# Altium PCB PCB_2023.PcbDoc
Units mm, origin at the board's own origin, x right, y up, seen from the top; angles counter-clockwise.
Board outline 30 x 42 mm, 6 copper layers (L1 (SGN), L2 (GND), L3 (SGN), L4 (GND/PWR), L5 (PWR/GND), L6 (SGN)), stack 0.77 mm thick; 57 components, 71 nets, 293 pads, 220 vias.
Unrouted connection lines stored in the file: 2.
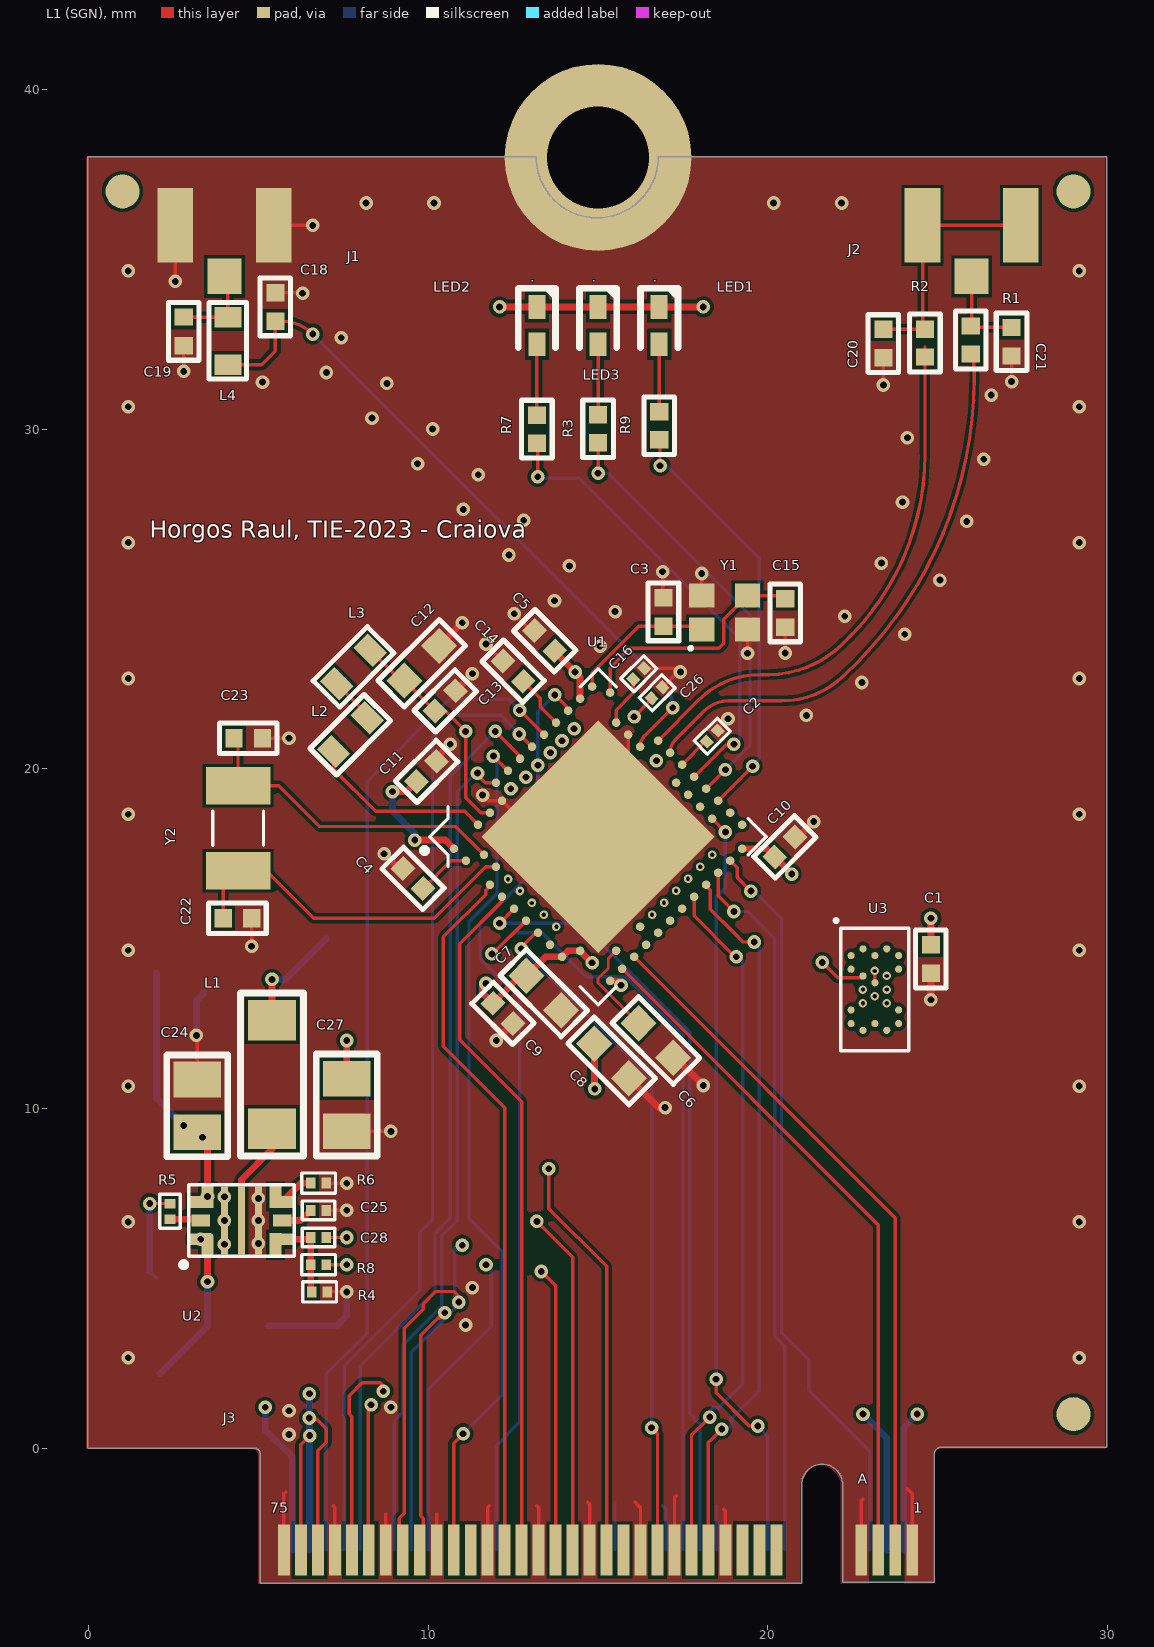
[diagram p0: L1 (SGN) view]
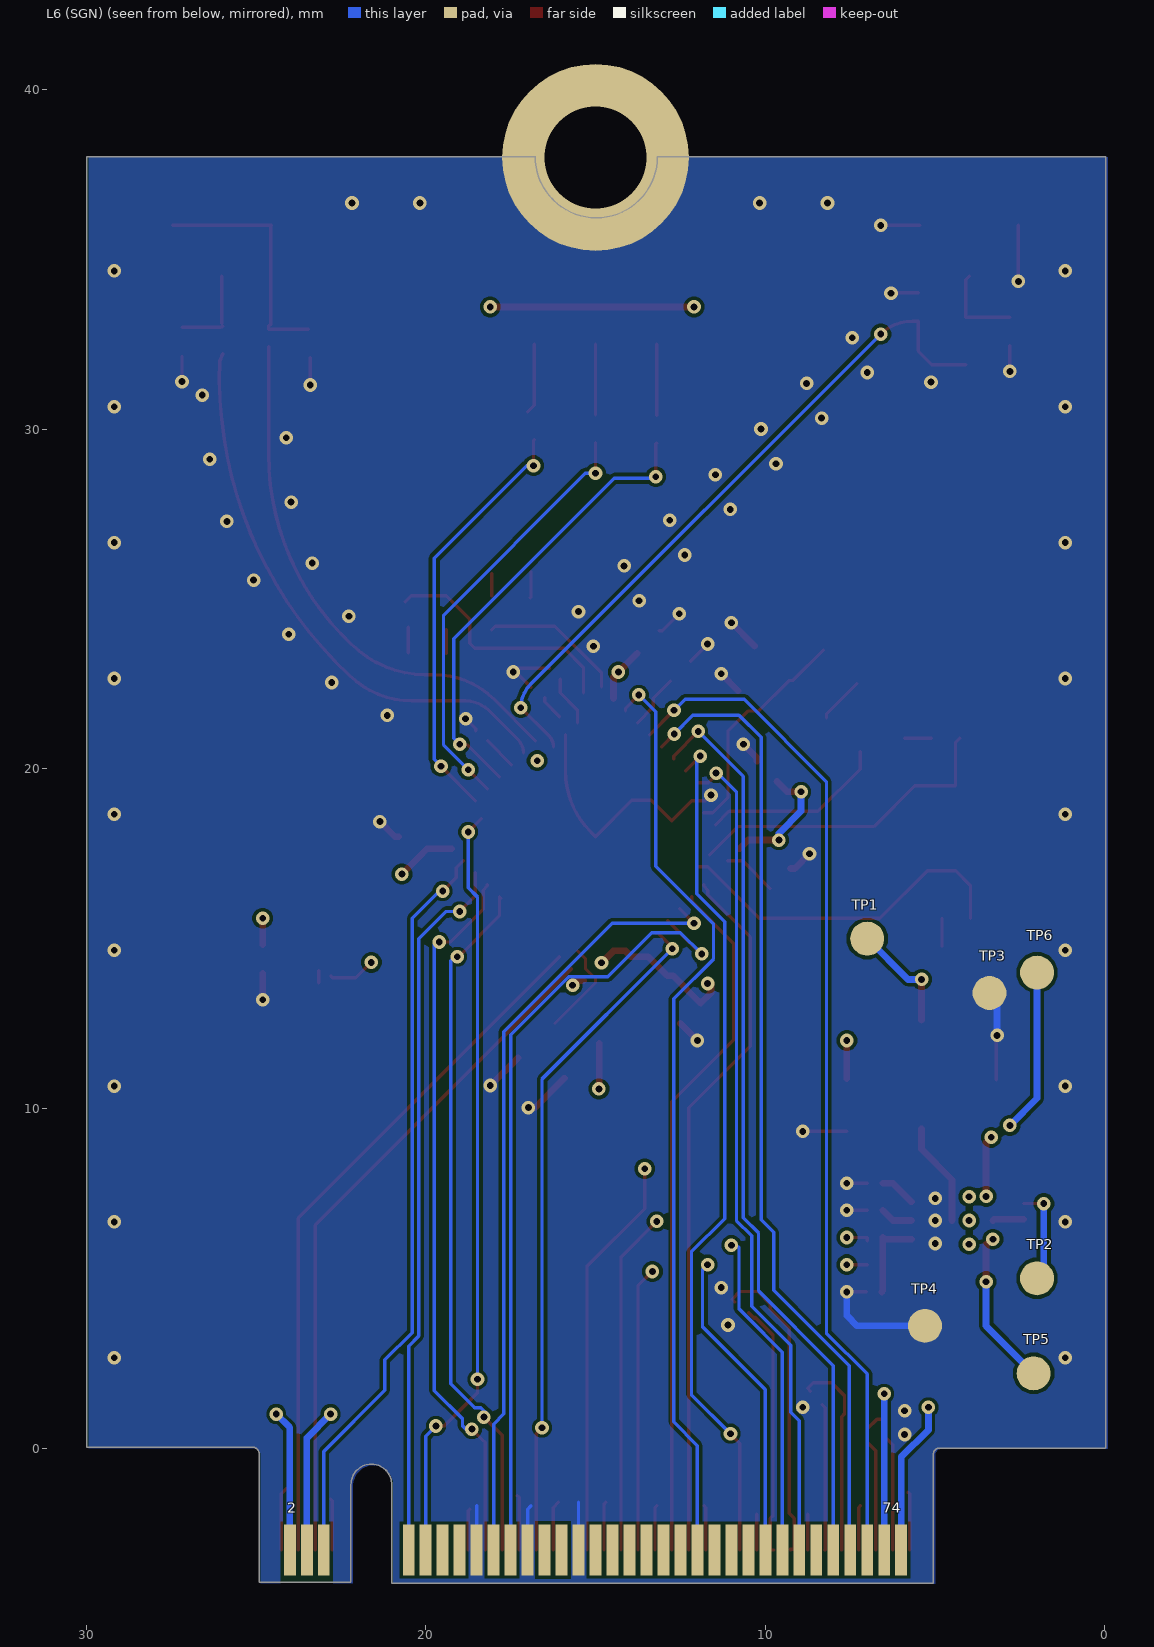
[diagram p1: L6 (SGN) view, seen from below]
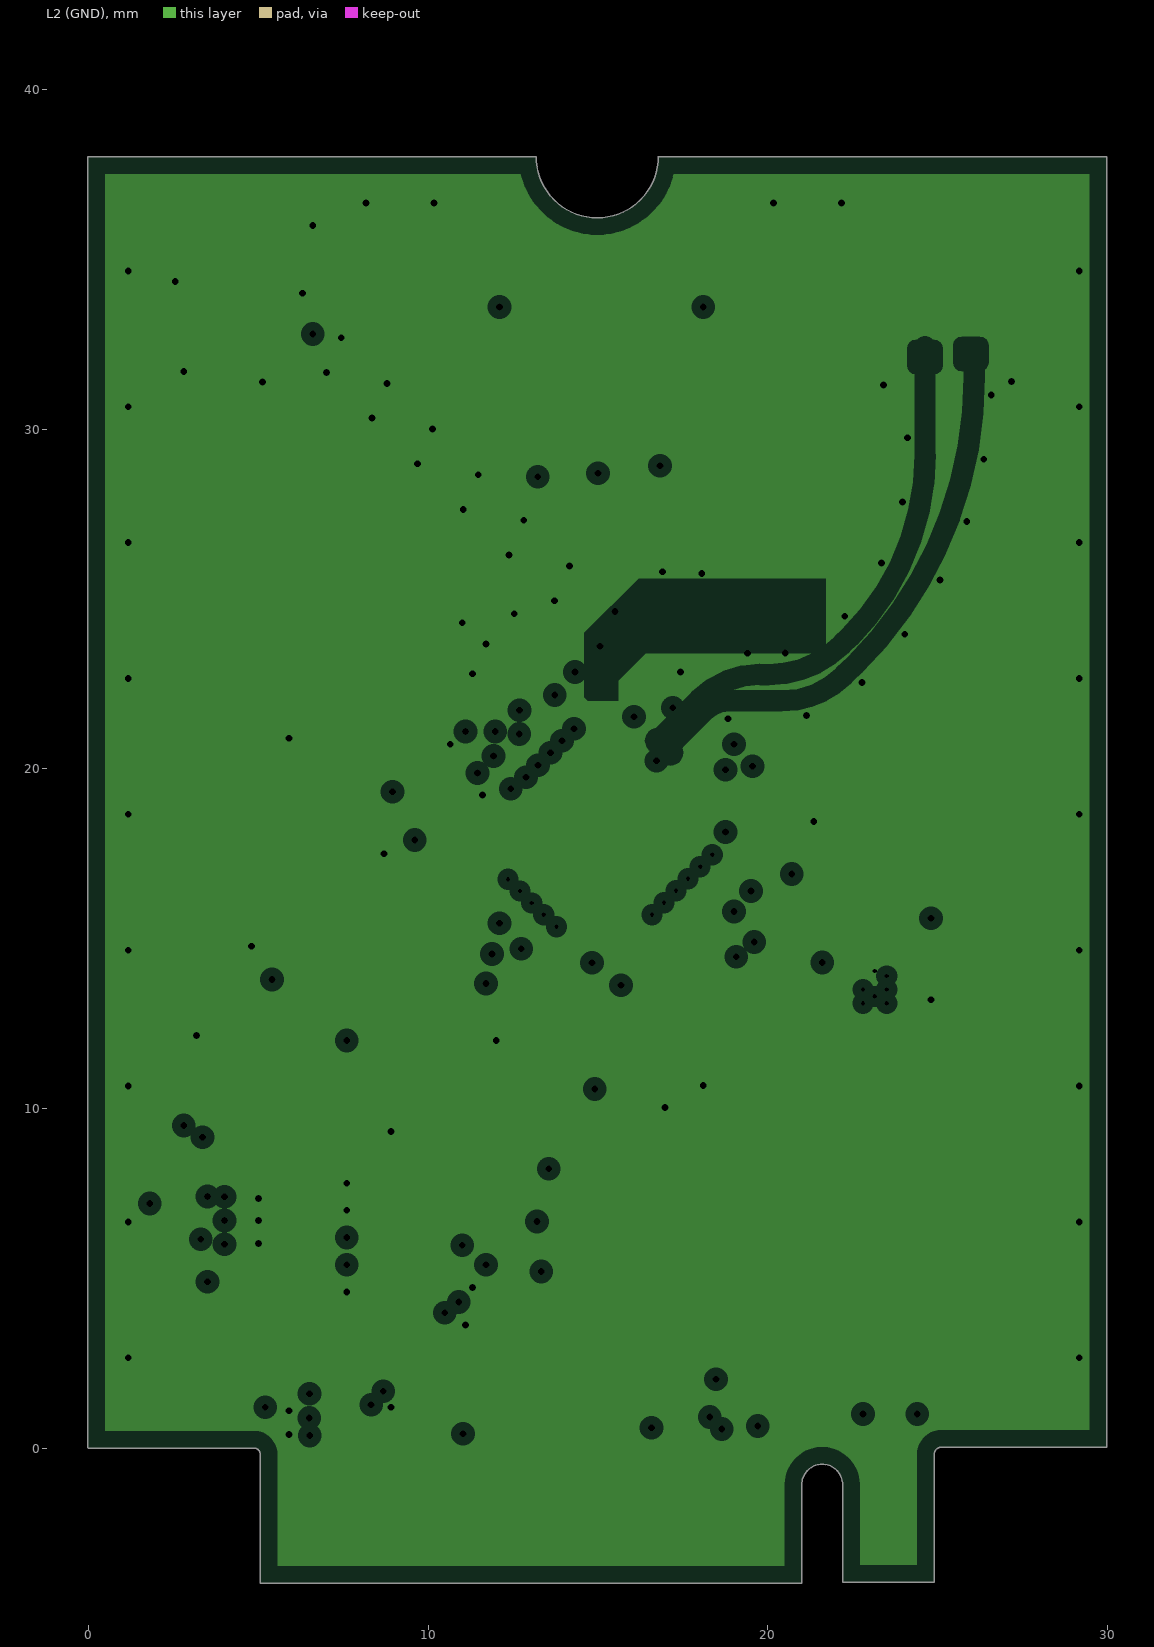
[diagram p2: L2 (GND), clearances drawn from the general rule]
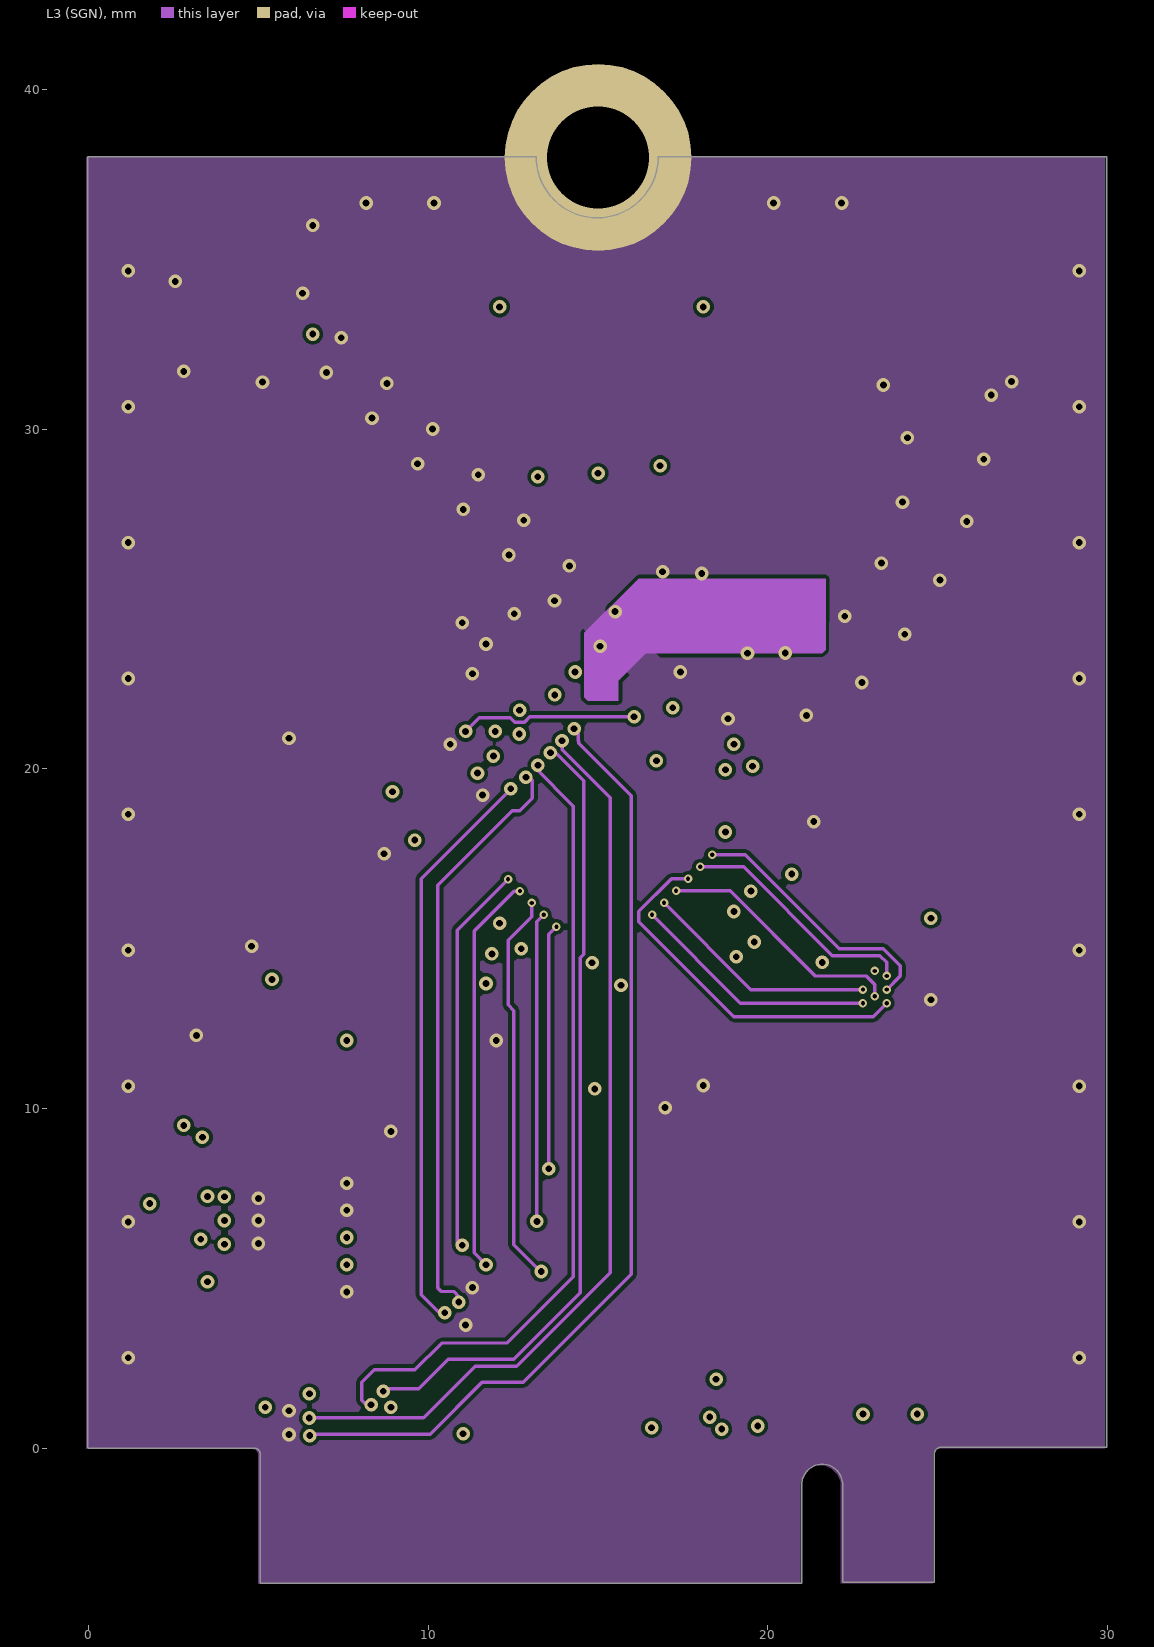
[diagram p3: L3 (SGN)]
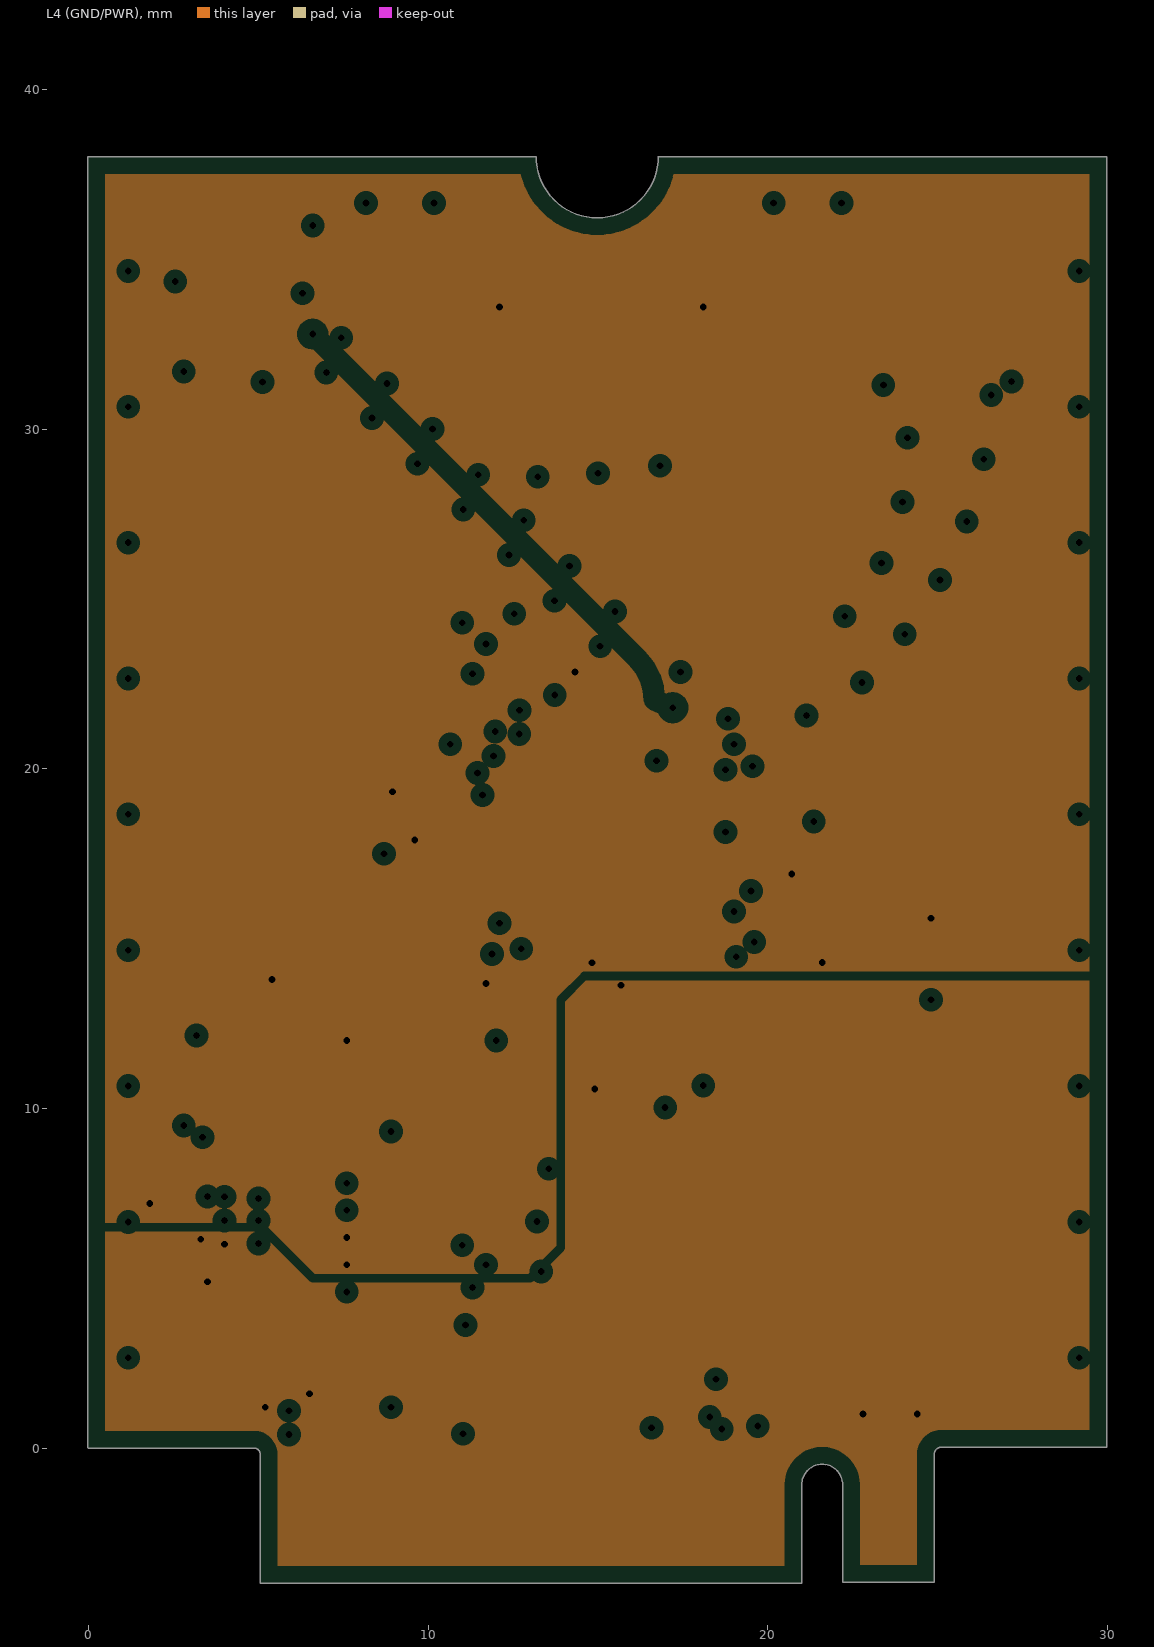
[diagram p4: L4 (GND/PWR), clearances drawn from the general rule]
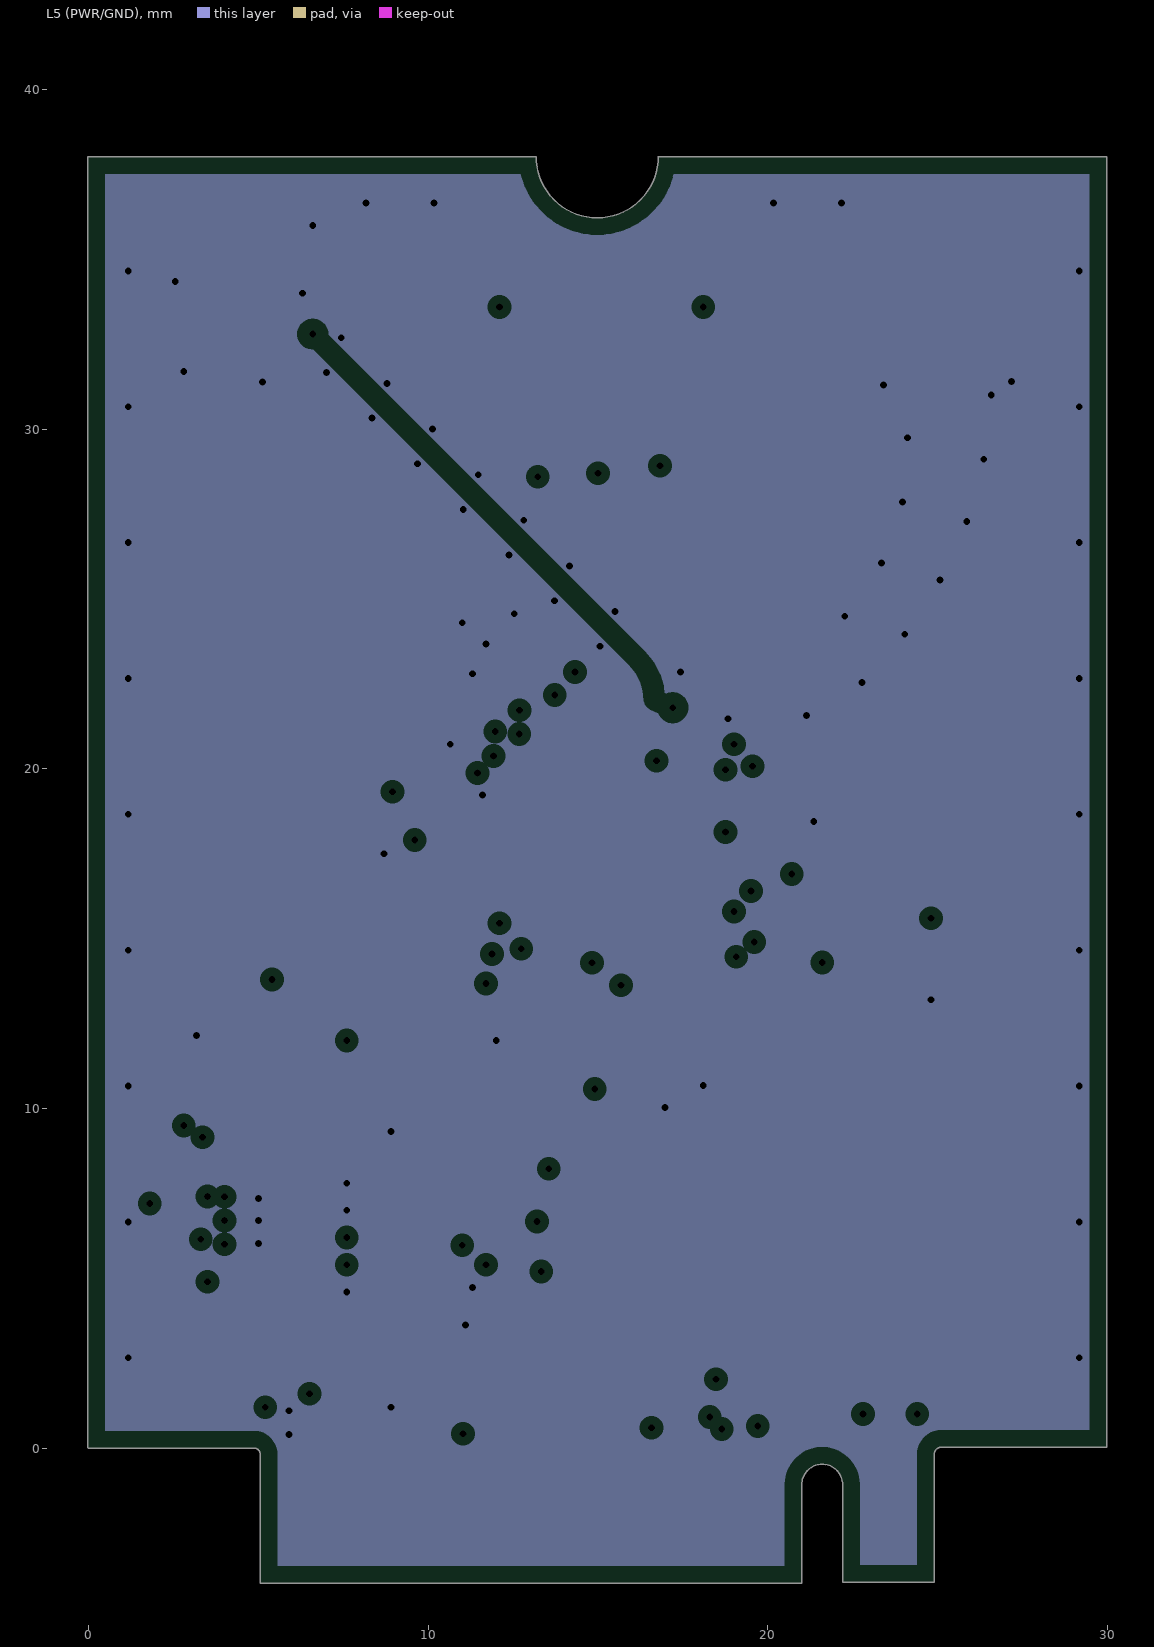
[diagram p5: L5 (PWR/GND), clearances drawn from the general rule]
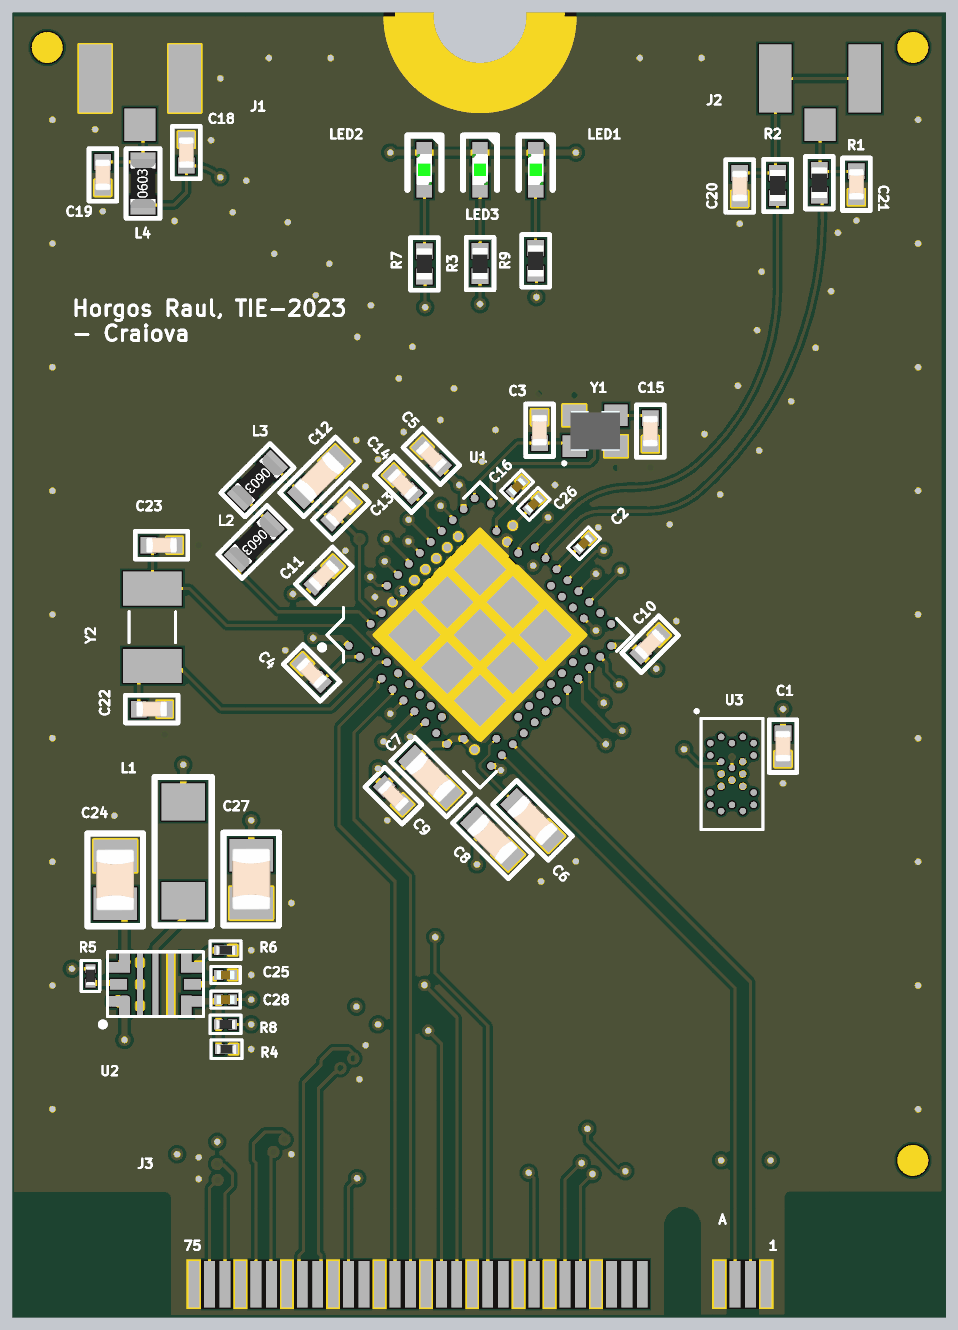
[diagram p6: 3D render of the assembled board from above, using the file's embedded part models]

## Layer stack, top to bottom
Top Solder: solder mask 0.025, Solder Resist, Dk 3.5
L1 (SGN): signal copper 0.035
Dielectric 1: prepreg 0.06, PP-006, Dk 4.1
L2 (GND): plane copper 0.015, net GND
Dielectric 2: prepreg 0.1, PP-006, Dk 4.1
L3 (SGN): signal copper 0.035
Dielectric 3: dielectric 0.1, FR-4, Dk 4.8
L4 (GND/PWR): plane copper 0.035, net VDD
Dielectric 4: core 0.26, PP-006, Dk 4.1
L5 (PWR/GND): plane copper 0.035, net GND
Dielectric 5: prepreg 0.06, PP-006, Dk 4.1
L6 (SGN): signal copper 0.035
Bottom Solder: solder mask 0.025, Solder Resist, Dk 3.5

## Board outline
5.05,-3.975 5.05,-0.175 ccw(c4.875,-0.175) 4.875,0 0,0 cw(c0,0.025) -0.025,0.025 -0.025,38.025 13.175,38.025 ccw(c14.975,38.025) 16.775,38.025 29.975,38.025 29.975,0.025 25.1,0.025 ccw(c25.1,-0.175) 24.9,-0.175 24.9,-3.95 22.2,-3.95 22.2,-1.075 ccw(c21.6,-1.075) 21.6,-0.475 ccw(c21.6,-1.075) 21,-1.075 21,-3.975

## Design rules (kind name [scope] priority, off if disabled: settings)
Clearance Clearance_VIA [InComponent('U1') or InComponent('U3') vs InComponent('U1') or InComponent('U3')] p1: gap=0 ignorepadtopadclearanceinfootprint=FALSE except(0.1: Arc-Arc Arc-Track Arc-SMDPad Track-Track Track-SMDPad SMDPad-THPad THPad-THPad THPad-Via Via-Via; 0.15: SMDPad-Via; 0.2: Arc-THPad Arc-Via Track-THPad Track-Via; 0.35: SMDPad-SMDPad)
Clearance [All] p2: gap=0.1 ignorepadtopadclearanceinfootprint=FALSE except(0.35: SMDPad-SMDPad)
DiffPairsRouting DiffPair_DiffPairsRouting [InDifferentialPairClass('D90')] p1: maxlimit=0.38 minlimit=0.38 mostfreqgap=0.38 toplayer_minwidth=0.1 toplayer_maxwidth=0.1 toplayer_prefwidth=0.1 midlayer1_minwidth=0.1 midlayer1_maxwidth=0.1 midlayer1_prefwidth=0.1 bottomlayer_minwidth=0.1 bottomlayer_maxwidth=0.1 bottomlayer_prefwidth=0.1 impedanceprofiledriven=TRUE impedanceprofileid={CCA79D93-A0CD-4789-A958-CFDB072DEA31} impedanceprofilevalue=90.000000 maxuncoupledlength=12.7
HoleToHoleClearance [All] p1: gap=0.1 allowstackedmicrovias=TRUE
MatchedLengths DiffPair_MatchedLengths [All] p1: tolerance=25.4 checknetsindiffpair=FALSE checkdiffpairvsdiffpair=TRUE checkxsignals=TRUE checkothers=TRUE
MinimumSolderMaskSliver [All] p1: minsoldermaskwidth=0.1
PlaneClearance [All] p1: clearance=0.25
PlaneConnect [All] p1: planeconnectstyle=Relief reliefexpansion=0.2 reliefentries=4 reliefconductorwidth=0.2 reliefairgap=0.2
PolygonConnect [All] p1: connectstyle=Direct reliefconductorwidth=0.254 reliefentries=4 polygonreliefangle="90 Angle" airgapwidth=0.254
RoutingVias [All] p1: holewidth=0.2 width=0.35 viastyle="Through Hole" minholewidth=0.125 minwidth=0.25 maxholewidth=0.2 maxwidth=0.4
SilkToSilkClearance [All] p1: silktosilkclearance=0.05
SilkToSolderMaskClearance [IsPad] p1: minsilkscreentomaskgap=0.1 clearancetoexposedcopper=TRUE
SolderMaskExpansion [All] p1: expansion=0.05 istentingtop=FALSE
SupplyNets "Schematic Supply Nets_2" [InNet('VDD')] p1: voltage=0.000
SupplyNets "Schematic Supply Nets_1" [InNet('GND')] p2: voltage=0.000
SupplyNets "Schematic Supply Nets" [InNet('VIN')] p3: voltage=0.000
Width [All] p1: maxlimit=0.2 minlimit=0.085 preferedwidth=0.1
Width Width_QSPI [InNet('QSPI_CLK') OR  InNet('QSPI_SIO0') OR  InNet('QSPI_SIO1') OR  InNet('QSPI_SIO2') OR  InNet('QSPI_SIO3')] p2: maxlimit=0.1 minlimit=0.1 preferedwidth=0.1 impedanceprofiledriven=TRUE impedanceprofileid={36FF9B39-CBAA-4236-8C2A-2FB4B282E5CC} impedanceprofilevalue=45.000000 minimp=50.000000 maximp=50.000000 favimp=50.000000
Width Width_RF [InNet('ANT') OR  InNet('NFC1') OR  InNet('NFC2')] p3: maxlimit=0.1 minlimit=0.1 preferedwidth=0.1 impedanceprofiledriven=TRUE impedanceprofileid={A57C08FE-674F-4B1E-938D-F273A4DC7C54} impedanceprofilevalue=50.000000 minimp=50.000000 maximp=50.000000 favimp=50.000000
23 further rules are at their usual default settings.

## Classes and differential pairs
differential pair USB_D: +USB_D_P -USB_D_N
differential pair REFCLK1: +REFCLK1_P -REFCLK1_N
differential pair REFCLK0: +REFCLK0_P -REFCLK0_N
differential pair PET1: +PET1_P -PET1_N
differential pair PER1: +PER1_P -PER1_N
differential pair PER0: +PER0_P -PER0_N

## Components (designator, comment, footprint, x,y, rotation, side; value= is the part's Value field where it differs from the comment)
C1 "100nF" CAP0402 24.8,14.4 r90 top
C2 "820pF" CAP0201 18.363,20.963 r225 top
C3 "12pF" CAP0402 16.925,24.62 r90 top
C4 "100nF" CAP0402 9.553,16.772 r315 top
C5 "1uF" CAP0402 13.428,23.772 r315 top
C6 "4.7uF" CAP0603 16.7,12 r135 top
C7 "4.7uF" CAP0603 13.4,13.4 r135 top
C8 "4.7uF" CAP0603 15.4,11.4 r135 top
C9 "100nF" CAP0402 12.2,12.8 r135 top
C10 "100nF" CAP0402 20.5,17.7 r225 top
C11 "100nF" CAP0402 9.95,19.925 r225 top
C12 "10uF" CAP0603 9.809,23.109 r225 top
C13 "100nF" CAP0402 10.5,22 r225 top
C14 "100nF" CAP0402 12.5,22.875 r315 top
C15 "12pF" CAP0402 20.51,24.59 r270 top
C16 "100pF" CAP0201 16.2,22.8 r45 top
C18 "0.7pF" CAP0402 5.5,33.6 r270 top
C19 "0.5pF" CAP0402 2.8,32.88 r90 top
C20 "100pF" CAP0402 23.4,32.52 r90 top
C21 "100pF" CAP0402 27.175,32.575 r270 top
C22 "12pF" CAP0402 4.38,15.6 r180 top
C23 "12pF" CAP0402 4.7,20.9 r180 top
C24 "10uF" CAP0805 3.2,10.075 r270 top
C25 "4.7nF" CAP0201 6.77,7 r180 top
C26 "100pF" CAP0201 16.737,22.237 r45 top
C27 "22uF" CAP0805 7.6,10.1 r90 top
C28 "10pF" CAP0201 6.77,6.2 r0 top
J1 "U.FL-LP-040" U.FL-R-SMT-1 4,36 r0 top locked
J2 "U.FL-LP-040" U.FL-R-SMT-1 26,36 r0 top locked
J3 "PCI_75_A" PCI_75_a 15,-3 r0 top locked
L1 "10uH" FB_1206 5.4,11 r90 top
L2 "10uH" FB_0603 7.705,21.005 r225 top
L3 "15uH" FB_0603 7.8,23 r225 top
L4 "4.7nH" FB_0603 4.1,32.6 r90 top
LED1 "APT1608SRCPRV" LED0402 16.8,33.05 r270 top
LED2 "APT1608SRCPRV" LED0402 13.2,33.05 r270 top
LED3 "APT1608SRCPRV" LED0402 15,33.05 r270 top locked
R1 "0R" RES0402 25.975,32.625 r90 top
R2 "0R" RES0402 24.625,32.535 r90 top
R3 "0R" RES0402 15,30.01 r90 top
R4 "100K" RES0201 6.8,4.6 r180 top
R5 "3.3K" RES0201 2.4,6.97 r90 top
R6 "6.8K" RES0201 6.77,7.8 r180 top
R7 "0R" RES0402 13.2,30 r90 top
R8 "49.9K" RES0201 6.77,5.4 r0 top
R9 "0R" RES0402 16.8,30.1 r90 top
TP1 "Testpoint" TestPoint 7,15 r90 bottom
TP2 "Testpoint" TestPoint 2,5 r90 bottom
TP3 "Testpoint" TestPoint 3.4,13.4 r90 bottom
TP4 "Testpoint" TestPoint 5.3,3.6 r90 bottom
TP5 "Testpoint" TestPoint 2.1,2.2 r90 bottom
TP6 "Testpoint" TestPoint 2,14 r90 bottom
U1 "TIE2023" TIE23_IC 15,18 r45 top locked
U2 "TPS62810-Q1" VQFN-9 4.5,6.7 r90 top
U3 "QSPI Memory" WLCSP-22 23.15,13.5 r0 top
Y1 "32MHz" XRCGB-2X1.6 18.725,24.6 r0 top
Y2 "32KHz" CFPX-3.2X1.5 4.4,18.25 r90 top

## Footprints (in the part's own frame and the unit in brackets; to place one, negate y for a bottom-side part, rotate by r counter-clockwise, add the part's x,y. Pads: shape width x height; smd on the part's side, far side on the other; paste and mask are expansions set on the pad)
CAP0201 [mm]
  rect 0.28x0.32 smd mask+0.05: 1(-0.23,0) 2(0.23,0)
  silkscreen extent -0.48,-0.28 0.48,0.28, body extent -0.3,-0.15 0.3,0.15, height 0.33
CAP0402 [mm]
  rect 0.51x0.535 smd mask+0.05: 1(-0.42,0) 2(0.42,0)
  silkscreen extent -0.85,-0.45 0.85,0.45, body extent -0.51,-0.25 0.51,0.25, height 0.51
CAP0603 [mm]
  rect 0.76x0.76 smd mask+0.05: 1(-0.72,0) 2(0.72,0)
  silkscreen extent -1.28,-0.55 1.28,0.55, body extent -0.8,-0.4 0.8,0.4, height 0.8
CAP0805 [mm]
  rect 1.05x1.4 smd mask+0.05: 1(-0.775,0) 2(0.775,0)
  silkscreen extent -1.5,-0.9 1.5,0.9, body extent -1,-0.62 1,0.63, height 1.26
CFPX-3.2X1.5 [mm] "32kHz Crystal"
  rect 1.1x1.9 smd mask+0.05: 1(-1.25,0) 2(1.25,0)
  silkscreen extent -0.5,-0.75 0.5,0.75, body extent -1.6,-1.25 1.6,1.25, height 1
FB_0603 [mm]
  rect 0.6x0.8 smd mask+0.05: 1(-0.7,0) 2(0.7,0)
  silkscreen extent -1.12,-0.55 1.12,0.55, body extent -0.8,-0.4 0.8,0.4, height 0.46
FB_1206 [mm]
  rect 1.2x1.4 smd mask+0.05: 1(-1.6,0) 2(1.6,0)
  silkscreen extent -2.4,-0.92 2.4,0.92, body extent -1.58,-0.8 1.58,0.8, height 0.6
LED0402 [mm]
  rect 0.7x0.5 smd mask+0.05: 1(0.55,0) 2(-0.55,0)
  silkscreen extent -1.1,-0.55 0.65,0.55, body extent -0.5,-0.25 0.5,0.25, height 0.16
PCI_75_a [mm]
  rect 0.35x1.5 smd mask+0: 1(9.25,0) 3(8.75,0) 5(8.25,0) 7(7.75,0) 17(5.25,0) 19(4.75,0) 21(4.25,0) 23(3.75,0) 25(3.25,0) 27(2.75,0) 29(2.25,0) 31(1.75,0) 33(1.25,0) 35(0.75,0) 37(0.25,0) 39(-0.25,0) 41(-0.75,0) 43(-1.25,0) 45(-1.75,0) 47(-2.25,0) 49(-2.75,0) 51(-3.25,0) 53(-3.75,0) 55(-4.25,0) 57(-4.75,0) 59(-5.25,0) 61(-5.75,0) 63(-6.25,0) 65(-6.75,0) 67(-7.25,0) 69(-7.75,0) 71(-8.25,0) 73(-8.75,0) 75(-9.25,0)
  rect 0.35x1.5 smd far side mask+0: 2(9,0) 4(8.5,0) 6(8,0) 16(5.5,0) 18(5,0) 20(4.5,0) 22(4,0) 24(3.5,0) 26(3,0) 28(2.5,0) 30(2,0) 32(1.5,0) 34(1,0) 36(0.5,0) 38(0,0) 40(-0.5,0) 42(-1,0) 44(-1.5,0) 46(-2,0) 48(-2.5,0) 50(-3,0) 52(-3.5,0) 54(-4,0) 56(-4.5,0) 58(-5,0) 60(-5.5,0) 62(-6,0) 64(-6.5,0) 66(-7,0) 68(-7.5,0) 70(-8,0) 72(-8.5,0) 74(-9,0)
RES0201 [mm]
  rect 0.28x0.32 smd mask+0.05: 1(-0.23,0) 2(0.23,0)
  silkscreen extent -0.5,-0.3 0.5,0.3, body extent -0.3,-0.15 0.3,0.15, height 0.23
RES0402 [mm]
  rect 0.51x0.54 smd mask+0.05: 1(-0.41,0) 2(0.41,0)
  silkscreen extent -0.85,-0.45 0.85,0.45, body extent -0.5,-0.25 0.5,0.25, height 0.35
TestPoint [mm]
  round 1 smd paste-10 mask+0.1: 1(0,0)
TIE23_IC [mm]
  round 0.25 smd mask+0.05: A8(-1,3.25) A10(-0.5,3.25) A12(0,3.25) A14(0.5,3.25) A16(1,3.25) A18(1.5,3.25) A20(2,3.25) A22(2.5,3.25) A23(3,3.25) AA24(3.25,-2.25) AB2(-2.75,-2.5) AC5(-2,-2.75) AC9(-1,-2.75) AC11(-0.5,-2.75) AC13(0,-2.75) AC15(0.5,-2.75) AC17(1,-2.75) AC19(1.5,-2.75) AC21(2,-2.75) AC24(3.25,-2.75) AD2(-2.75,-3.25) AD4(-2.25,-3.25) AD6(-1.75,-3.25) AD8(-1.25,-3.25) AD10(-0.75,-3.25) AD12(-0.25,-3.25) AD14(0.25,-3.25) AD16(0.75,-3.25) AD18(1.25,-3.25) AD20(1.75,-3.25) AD22(2.25,-3.25) AD23(2.75,-3.25) B1(-3.25,2.75) B3(-2.25,2.75) B5(-1.75,2.75) B7(-1.25,2.75) B9(-0.75,2.75) B11(-0.25,2.75) B13(0.25,2.75) B15(0.75,2.75) B17(1.25,2.75) B19(1.75,2.75) B24(3.25,2.75) C1(-3.25,2.25) D2(-2.75,2) D23(2.75,2) E24(3.25,1.75) F2(-2.75,1.5) F23(2.75,1.5) G1(-3.25,1.25) H2(-2.75,1) H23(2.75,1) J1(-3.25,0.75) J24(3.25,0.75) K2(-2.75,0.5) L1(-3.25,0.25) L24(3.25,0.25) M2(-2.75,0) N1(-3.25,-0.25) N24(3.25,-0.25) P2(-2.75,-0.5) P23(2.75,-0.5) R1(-3.25,-0.75) R24(3.25,-0.75) T2(-2.75,-1) T23(2.75,-1) U1(-3.25,-1.25) U24(3.25,-1.25) V23(2.75,-1.5) W1(-3.25,-1.75) W24(3.25,-1.75) Y2(-2.75,-2) Y23(2.75,-2)
  rect 1.2x1.2 on Top Paste mask+0.05: TPAD*10(-1.5,0) TPAD*10(-1.5,-1.5) TPAD*10(-1.5,1.5) TPAD*10(0,0) TPAD*10(0,1.5) TPAD*10(0,-1.5) TPAD*10(1.5,1.5) TPAD*10(1.5,-1.5) TPAD*10(1.5,0)
  rect 4.85x4.85 smd paste-4 mask+0.05: TPAD*10(0,0)
  silkscreen extent -3.94,-3.5 3.5,3.75
U.FL-R-SMT-1 [mm]
  rect 1x1.05 smd mask+0.05: 1(0,-1.5)
  rect 1.05x2.2 smd mask+0.05: 2(-1.45,0) 3(1.45,0)
VQFN-9 [mm]
  rrect50% 0.675x0.35 smd mask+0.05: 1(-0.71,1)
  rrect50% 0.35x0.675 smd mask+0.05: 1(-0.55,1.2)
  rect 2x0.2 smd mask+0.05: 2(0,0.5) 3(0,0) 4(0,-0.5)
  rect 0.675x0.35 smd mask+0.05: 5(-0.71,-1) 7(0.71,-1) 8(0.71,1)
  rect 0.35x0.675 smd mask+0.05: 5(-0.55,-1.2) 7(0.55,-1.2) 8(0.55,1.2)
  rect 0.35x0.55 smd mask+0.05: 6(0,-1.2) 9(0,1.2)
  silkscreen extent -1.34,-1.55 1.05,1.74
WLCSP-22 [mm]
  round 0.21 smd mask+0.05: A2(-0.7,-0.6) A4(-0.7,-1) B1(-0.35,-1.2) B3(0,-1) B5(0.35,-1.2) C1(0.7,-1) C5(0.7,-0.6) D2(-0.35,0.4) D4(0.35,0.4) E3(0,0.2) F2(-0.35,0) F4(0.35,0) G3(0,-0.2) H2(-0.35,-0.4) H4(0.35,-0.4) J1(-0.7,1) J5(-0.7,0.6) K1(-0.35,1.2) K3(0,1) K5(0.35,1.2) L2(0.7,1) L4(0.7,0.6)
  silkscreen extent -1.19,-1.8 1,2.08
XRCGB-2X1.6 [mm] "32MHz Crystal"
  rect 0.75x0.7 smd mask+0.05: 1(-0.675,-0.5) 2(0.675,-0.5) 3(0.675,0.5) 4(-0.675,0.5)
  silkscreen extent -1.05,-1.1 -0.95,-1, body extent -0.8,-0.64 0.8,0.64, height 0.5

## Part data
C1 C4 C9 C10 C11 C13 C14: library part GCM155R71C224KE02J, "CAP CER 100nF 16V X7R 0402", Manufacturer=Murata, Package=0402, Manufacturer Part Number=GCM155R71C224KE02J
C2: library part GRM033C81A473ME05D_1, "CAP CER 820pF 20% 10V X6S 0201", Manufacturer=Murata, Manufacturer Part Number=GRM033C81A473ME05D, Package=0201, .Checked_PCB=AI, .Checked_SCH=AI, .Creator=AI
C3 C15 C22 C23: library part GCM155R71C224KE02J_1, "CAP CER 12pF 16V X7R 0402", Manufacturer=Murata, Manufacturer Part Number=GCM155R71C224KE02J, Package=0402
C5: library part GCM155R71C224KE02J_1uF, "CAP CER 1uF 16V X7R 0402", Manufacturer=Murata, Manufacturer Part Number=GCM155R71C224KE02J, Package=0402
C6 C7 C8: library part GCJ188R71E105KA01D, "CAP CER 4.7uF 25V X7R 0603", Manufacturer=Murata, Package=0603, .Checked_PCB=IC, .Checked_SCH=IC, .Creator=IC, Manufacturer Part Number=GCJ188R71E105KA01D
C12: library part GCJ188R71E105KA01D_1, "CAP CER 10uF 25V X7R 0603", Manufacturer=Murata, Manufacturer Part Number=GCJ188R71E105KA01D, Package=0603, .Checked_PCB=IC, .Checked_SCH=IC, .Creator=IC
C16 C26: library part GRM033C81A473ME05D_100pF, "CAP CER 100pF 20% 10V X6S 0201", Manufacturer=Murata, Manufacturer Part Number=GRM033C81A473ME05D, Package=0201, .Checked_PCB=AI, .Checked_SCH=AI, .Creator=AI
C18: library part GCM155R71C224KE02J_0.7pF, "CAP CER 0.7pF 16V X7R 0402", Manufacturer=Murata, Manufacturer Part Number=GCM155R71C224KE02J, Package=0402
C19: library part GCM155R71C224KE02J_0.5pF, "CAP CER 0.5pF 16V X7R 0402", Manufacturer=Murata, Manufacturer Part Number=GCM155R71C224KE02J, Package=0402
C20 C21: library part GCM155R71C224KE02J_100pF, "CAP CER 100pF 16V X7R 0402", Manufacturer=Murata, Manufacturer Part Number=GCM155R71C224KE02J, Package=0402
C24: library part GCM21BR70J106KE10uF, "CAP CER 10uF 10% 6.3V X7R 0805", Manufacturer=Murata, Manufacturer Part Number=GCM21BR70J106KE22K, Package=0805, .Checked_PCB=AI, .Checked_SCH=AI, .Creator=AI
C25: library part GRM033C81A473ME05D_2, "CAP CER 4.7nF 20% 10V X6S 0201", Manufacturer=Murata, Manufacturer Part Number=GRM033C81A473ME05D, Package=0201, .Checked_PCB=AI, .Checked_SCH=AI, .Creator=AI
C27: library part GCM21BR70J106KE22K, "CAP CER 22uF 10% 6.3V X7R 0805", Manufacturer=Murata, .Checked_PCB=AI, .Checked_SCH=AI, .Creator=AI, Manufacturer Part Number=GCM21BR70J106KE22K
C28: library part GRM033C81A473ME05D, "CAP CER 10pF 20% 10V X6S 0201", Manufacturer=Murata, Package=0201, .Checked_PCB=AI, .Checked_SCH=AI, .Creator=AI, Manufacturer Part Number=GRM033C81A473ME05D
J1 J2: "Ultra Small Surface Mount Coaxial Connectors"
J3: "M2 Key A Edge Connector"
L1: library part IND1206, "Power Inductors - SMD 0603 10uH 20%", Package=1206
L2: library part IND0603_10uH, "Power Inductors - SMD 3655 0603 4N7 +/- 0.3nH T&R", Package=0603
L3: library part IND0603_15uH, "Power Inductors - SMD 3655 0603 4N7 +/- 0.3nH T&R", Package=0603
L4: library part IND0603, "Power Inductors - SMD 3655 0603 4N7 +/- 0.3nH T&R", Package=0603
LED1 LED2 LED3: "Standard LEDs - SMD RED WATER CLEAR", Manufacturer=Kingbright, .Checked_PCB=IC, .Checked_SCH=IC, Manufacturer Part Number=APT1608SRCPRV, Parameter 1=0402
R1 R2 R3 R7 R9: library part RC0402FR-07392RL, "RES SMD 0 OHM 1% 1/16W 0402", Manufacturer=Yageo, Package=0402, Manufacturer Part Number=RC0402FR-07392RL
R4: library part RC0201FR-07330RL, "RES SMD 100K OHM 1% 1/20W 0201", Manufacturer=Yageo, Package=0201, .Checked_PCB=AI, .Checked_SCH=AI, .Creator=AI, Manufacturer Part Number=RC0201FR-07330RL
R5: library part RC0201FR-073300, "RES SMD 3.3KK OHM 1% 1/20W 0201", Manufacturer=Yageo, Manufacturer Part Number=RC0201FR-07330RL, Package=0201, .Checked_PCB=AI, .Checked_SCH=AI, .Creator=AI
R6: library part RC0201FR-07330RL_2, "RES SMD 6.8K OHM 1% 1/20W 0201", Manufacturer=Yageo, Manufacturer Part Number=RC0201FR-07330RL, Package=0201, .Checked_PCB=AI, .Checked_SCH=AI, .Creator=AI
R8: library part RC0201FR-07330RL_1, "RES SMD 49.9K OHM 1% 1/20W 0201", Manufacturer=Yageo, Manufacturer Part Number=RC0201FR-07330RL, Package=0201, .Checked_PCB=AI, .Checked_SCH=AI, .Creator=AI
TP1 TP2 TP3 TP4 TP5 TP6: "• SMD Pad diameter of 1mm. / • Solder mask opening = 0.075mm from pad edge;"
U1: "Bluetooth, NFC and ANT+ IC"
U2: "Switching Voltage Regulators Automotive 2.75-V to 6-V 4-A step-down"
U3: library part MX25R6435F, "NOR Flash Serial NOR 1.65V-3.6V 64Mbit x4 I/O WLCSP-22", Package=MX25R6435F
Y1: library part XRCGB30, "A 2 x 1.6mm SMD crystal in a ceramic package"
Y2: library part CFPX-217, "A 3.2 x 1.5mm SMD crystal in a ceramic package with a seam / sealed metal lid, hermetically sealed"

## Free pads (board coordinates)
  round 1 smd paste-0.5: F1(1,37) F2(29,37) F3(29,1)
  round 5.5 hole 3 mask+0.375: ""(15,38)

## Via types
v1: diameter 0.4, hole 0.2, L1 (SGN) to L6 (SGN), tented top, 95 vias
v2: diameter 0.4, hole 0.2, L1 (SGN) to L6 (SGN), 41 vias
v3: diameter 0.4, hole 0.2, L2 (GND) to L3 (SGN), tented top, 20 vias
v4: diameter 0.4, hole 0.2, L1 (SGN) to L2 (GND), tented top, 20 vias
v5: diameter 0.25, hole 0.125, L2 (GND) to L3 (SGN), tented top, 18 vias
v6: diameter 0.25, hole 0.125, L1 (SGN) to L2 (GND), tented top, 18 vias
v7: diameter 0.4, hole 0.2, L1 (SGN) to L6 (SGN), tented bottom, 8 vias

## Nets (pads, with @x,y where several pads share a name; then routed paths per layer and width w, separated by ;. In a path a pad name is that pad's centre, name@x,y a point inside that pad or via, vN(x,y) a via of type N, cw(c..) or ccw(c..) an arc to the next point about the centre after c; other vN are vias at no path point)
ALERT: J3.62 U1.A8 | length 24.6
  L1 (SGN) w0.1: v1(11.45,19.875) 11.425,19.85 11.684,19.591 U1.A8
  L6 (SGN) w0.1: J3.62 9,0.805 9.25,1.055 9.25,1.345 9.25,3.025 10.4,4.175 10.4,6.25 10.85,6.7 10.85,19.325 11.4,19.875 v1(11.45,19.875)
CLKREFQ0: J3.53
CLKREQ1: J3.68 U1.A14 | length 28.6
  L1 (SGN) w0.1: v1(12.682,21.025) U1.A14
  L6 (SGN) w0.1: J3.68 7.525,-2.975 7.525,2.425 9.75,4.65 9.75,6.35 10.125,6.725 10.125,20.925 10.775,21.575 12.132,21.575 v1(12.682,21.025)
COEX3: J3.41 U1.P2 | length 19.2
  L1 (SGN) w0.1: v1(13.2,6.675) 14.25,5.625 14.25,-0.225 J3.41
  L3 (SGN) w0.1: v1(13.2,6.675) 13.2,8.08 13.2,8.37 13.2,15.5 v6(13.4,15.7)
  other v5: 13.4,15.7
COEX_RXD: J3.31 U1.R1 | length 20.1
  L1 (SGN) w0.1: v1(12.738,14.705) 12.8,14.705 12.8,14.8 13.172,15.172 U1.R1 ; v1(16.575,0.6) 16.75,0.425 J3.31
  L6 (SGN) w0.1: v1(12.738,14.705) 16.575,10.868 v1(16.575,0.6)
COEX_TXD: J3.28 U1.N1 | length 23.7
  L1 (SGN) w0.1: v1(11.875,14.55) 11.904,14.55 U1.N1
  L6 (SGN) w0.1: v1(11.875,14.55) 12.5,15.175 13.35,15.175 14.644,13.881 15.794,13.881 17.5,12.175 17.5,11.025 17.5,0.922 J3.28
DP_ML0_N: J3.32
DP_ML0_P: J3.34
DP_ML2P: U1.AD12
GND: C1.1 C2.1 C3.2 C4.1 C5.1 C6.1 C7.1 C8.1 C9.1 C10.1 C11.1 C12.1 C13.1 C14.1 C15.2 C16.2 C18.1 C19.1 C20.1 C21.2 C22.1 C23.1 C24.1 C25.1 C26.2 C27.1 J1.2 J1.3 J3.1 J3.7 J3.23 J3.24 J3.29 J3.30 J3.33 J3.36 J3.39 J3.45 J3.51 J3.57 J3.63 J3.69 J3.75 pad. R4.1 R6.1 TP3.1 TP4.1 U1.B7 U1.F23 U1.TPAD*10@15,18 U2.4 U3.E3 Y1.2 Y1.4 | length 60
  L1 (SGN) w0.085: C6.1 C6.1@17.284,11.491
  L1 (SGN) w0.1: v1(2.55,34.35) J1.2 ; v1(2.8,31.7) C19.1 ; C24.1 v1@3.2,12.125 ; v4(4.8,14.775) C22.1 ; C23.1 v4(5.9,20.9) ; J1.3 v1(6.6,36) ; C18.1 6.28,34.02 v1(6.3,34) ; J3.75 5.75,-1.35 5.8,-1.3 ; C25.1 v1(7.6,7) ; R6.1 v1(7.6,7.8) ; R4.1 v1(7.6,4.6) ; 7.2,-1.7 7.25,-1.75 J3.69 ; C27.1 v1(8.9,9.325) ; J3.63 8.75,-1.95 ; J3.57 10.25,-1.95 ; v1(11.6,19.225) 11.764,19.061 U1.B7 12.761,18.472 13.36,19.071 13.929,19.071 15,18 15.14,18.14 ccw(c13.344,19.936) 15.884,19.936 U1.F23 ; v1(11.7,23.675) C14.1 ; J3.51 11.75,-1.75 11.8,-1.7 ; v1@12.525,24.575 13.031,24.069 C5.1 ; 13.2,-1.7 13.25,-1.75 J3.45 ; 14.7,-1.6 14.75,-1.65 J3.39 ; 16.1,-1.6 16.25,-1.75 J3.33 ; C16.2 17.312,22.963 v1(17.425,22.85) 17.35,22.85 C26.2 ; v4(16.9,25.8) 16.9,25.065 C3.2 ; J3.29 17.25,-1.45 17.3,-1.4 ; Y1.4 v4(18.05,25.75) ; C2.1 18.525,21.175 v1(18.825,21.475) ; 18.7,-1.8 18.75,-1.85 J3.23 ; v4(19.4,23.4) Y1.2 ; v4(20.51,23.41) C15.2 ; J3.7 22.75,-1.55 22.8,-1.5 ; U3.E3 v6(23.15,14.05) ; v1(23.4,31.3) C20.1 ; 24.1,-1.2 24.25,-1.35 J3.1 ; v1(27.175,31.4) 27.15,31.425 ccw(c27.09,31.485) 27.175,31.485 C21.2
  L1 (SGN) w0.2: v1(8.7,17.5) 9.131,17.069 C4.1 ; C11.1 10.247,20.322 v1(10.647,20.722) ; C12.1 v1(11,24.3) ; C13.1 v1(11.3,22.8) ; v1(12,12) 12.497,12.497 C9.1 ; C8.1 16.775,10.025 v1(16.975,10.025) ; C6.1@17.284,11.491 v1(18.1,10.675) ; C10.1 20.897,17.997 21.346,18.446 v1(21.349,18.446) ; v1(24.8,13.2) C1.1
  L6 (SGN) w0.1: J3.36 15.5,-1.6 ; 16.9,-1.7 17,-1.8 J3.30 ; J3.24 18.5,-1.7
  L6 (SGN) w0.2: v1(3.175,12.15) 3.175,13.175 TP3.1 ; TP4.1 7.3,3.6 7.6,3.9 v1(7.6,4.6)
  other v1: 5.9,0.4 5.9,1.1 8.9,1.2 11.1,3.625 11.3,4.725 5,6.025 5,6.7 5,7.35 12.532,24.562
  other v2: 1.17,2.659 29.17,2.659 1.17,6.659 29.17,6.659 1.17,10.659 29.17,10.659 1.17,14.659 29.17,14.659 1.17,18.659 29.17,18.659 21.135,21.572 22.769,22.542 1.17,22.659 29.17,22.659 15.061,23.608 15.501,24.63 13.718,24.951 14.158,25.973 12.374,26.295 1.17,26.659 29.17,26.659 12.814,27.317 11.031,27.638 23.962,27.853 11.471,28.66 9.687,28.982 10.127,30.004 8.344,30.325 1.17,30.659 29.17,30.659 8.784,31.347 5.121,31.387 7,31.669 7.44,32.691 1.17,34.659 29.17,34.659 8.17,36.659 10.17,36.659 20.17,36.659 22.17,36.659
  other v3: 4.8,14.775 5.9,20.9 19.4,23.4 20.51,23.41 18.05,25.75 16.9,25.8
  other v5: 23.15,14.05
  other v7: 24.03,23.963 22.261,24.494 25.066,25.555 23.342,26.057 25.854,27.284 26.355,29.117 24.108,29.747 26.577,31.004
I2C_CLK: J3.60 U1.H2 | length 21.2
  L3 (SGN) w0.1: v1(11,5.975) 10.875,5.975 10.85,6 10.85,15.25 v6(12.35,16.75)
  L6 (SGN) w0.1: J3.60 9.5,2.825 10.55,3.875 10.775,4.1 10.775,5.9 10.85,5.975 v1(11,5.975)
  other v5: 12.35,16.75
I2C_DATA: J3.58 U1.K2 | length 21
  L3 (SGN) w0.1: v1(11.7,5.4) 11.35,5.75 11.35,13.515 11.35,13.845 11.35,15.225 12.525,16.4 v6(12.7,16.4)
  L6 (SGN) w0.1: J3.58 10,1.725 11.85,3.575 11.85,5.25 v1(11.7,5.4)
  other v5: 12.7,16.4
LED_1: J3.6 U1.AD22 | length 22.1
  L1 (SGN) w0.1: U1.AD22 19.1,17.082 19.1,16.8 v1(19.5,16.4)
  L6 (SGN) w0.1: v1(19.5,16.4) 19.6,16.4 20.4,15.6 20.4,3.4 21.2,2.6 21.2,1.7 23,-0.1 J3.6
LED_2: J3.16 U1.AD20 | length 21
  L1 (SGN) w0.1: U1.AD20 18.536,16.264 v1(19,15.8)
  L6 (SGN) w0.1: v1(19,15.8) 19.4,15.8 20.2,15 20.2,3.3 20.5,3 J3.16
LED_B: R3.1 U1.U24 | length 12.8
  L1 (SGN) w0.1: v1(15,28.7) R3.1 ; U1.U24 18.189,19.414 v1(18.75,19.975)
  L6 (SGN) w0.1: v1(15,28.7) 15.3,28.7 19.475,24.525 19.475,20.7 v1(18.75,19.975)
LED_G: R7.1 U1.R24 | length 13.6
  L1 (SGN) w0.1: R7.1 13.225,29.565 v1(13.225,28.6) ; U1.R24 18.761,20.7 v1@18.975,20.7
  L6 (SGN) w0.1: v1(13.225,28.6) 13.275,28.55 14.45,28.55 19.175,23.825 19.175,20.9 v1(19,20.725)
LED_R: R9.1 U1.W24 | length 12.5
  L1 (SGN) w0.1: R9.1 16.825,29.665 v1(16.825,28.925) ; U1.W24 v1(19.55,20.075)
  L6 (SGN) w0.1: v1(16.825,28.925) 17.025,28.925 19.75,26.2 19.75,20.275 v1(19.55,20.075)
NetC2_2: C2.2 U1.N24 | length 1
  L1 (SGN) w0.1: U1.N24 C2.2@18.177,20.823
NetC3_1: C3.1 U1.A23 Y1.1 | length 4.2
  L1 (SGN) w0.1: U1.A23 14.823,22.823 16.2,24.2 C3.1 17.95,24.2 Y1.1
NetC4_2: C4.2 U1.C1 | length 1.6
  L1 (SGN) w0.1: C4.2 10.668,17.293 U1.C1
NetC6_2: C6.2 U1.AC5 | length 2.8
  L1 (SGN) w0.085: U1.AC5 15.3,14.411 15.3,14.125 15,13.825 15,13.7 C6.2
NetC12_2: C12.2 C13.2 C26.1 L3.1 U1.B5 U1.E24 | length 12.6
  L1 (SGN) w0.1: L3.1 9.19,22.6 C12.2 10.197,21.703 C13.2 10.497,21.703 v4(11.1,21.1) 11.1,19.15 11.543,18.707 U1.B5 ; v4(16.061,21.536) 16.5,21.975 C26.1@16.5,22.1
  L3 (SGN) w0.1: v4(11.1,21.1) 11.5,21.5 12.419,21.5 12.544,21.375 12.834,21.375 12.991,21.532 14.148,21.532 14.438,21.532 v3@16.057,21.532
  other v3: 11.1,21.1 16.061,21.536
NetC14_2: C14.2 U1.A18 | length 1.6
  L1 (SGN) w0.1: C14.2 13.3,22.075 13.3,21.821 U1.A18
NetC15_1: C15.1 U1.B24 Y1.3 | length 7.3
  L1 (SGN) w0.1: U1.B24 15.354,22.979 15.925,23.55 18.55,23.55 18.7,23.7 18.7,24.4 Y1.3 20.42,25.1 C15.1@20.6,24.92
NetC16_1: C16.1 U1.D23 | length 1.5
  L1 (SGN) w0.1: U1.D23 15.53,21.73 16.037,22.237 C16.1
NetC18_2: C18.2 L4.1 U1.H23 | length 20.5
  L1 (SGN) w0.1: L4.1 5.1,31.9 5.5,32.3 C18.2 5.683,33.18 cw(c5.683,31.883) v1(6.6,32.8) ; U1.H23 cw(c16.686,20.652) 16.369,20.969 v1(17.2,21.8)
  L6 (SGN) w0.1: v1(6.6,32.8) 16.917,22.483 cw(c16.234,21.8) v1(17.2,21.8)
NetC19_2: C19.2 J1.1 L4.2 | length 2.5
  L1 (SGN) w0.1: C19.2 L4.2 4.1,34.4 J1.1
NetC20_2: C20.2 J2.2 J2.3 R2.2 | length 7.2
  L1 (SGN) w0.1: C20.2@23.45,32.945 R2.2 24.625,33.045 24.561,33.083 24.561,35.989 J2.2 J2.3
NetC21_1: C21.1 J2.1 R1.2 | length 2.6
  L1 (SGN) w0.1: R1.2 ccw(c26.072,33.132) 26.072,32.995 C21.1 ; R1.2@26,33.12 J2.1
NetC22_2: C22.2 U1.F2 Y2.1 | length 10.4
  L1 (SGN) w0.1: C22.2 3.96,16.56 Y2.1 5.225,17 6.625,15.6 10.175,15.6 11.691,17.116 U1.F2
NetC23_2: C23.2 U1.D2 Y2.2 | length 9.5
  L1 (SGN) w0.1: C23.2 4.4,20.78 Y2.2 5.6,19.5 6.8,18.3 10.811,18.3 U1.D2
NetC25_2: C25.2 U2.6 | length 1
  L1 (SGN) w0.2: U2.6 6.24,6.7 C25.2
NetC28_1: C28.1 R4.2 R8.1 U2.5 | length 2.5
  L1 (SGN) w0.2: U2.5@5.7,6.15 6.49,6.15 C28.1 R8.1 6.54,4.63 R4.2
NetL1_1: L1.1 U2.3 | length 3.1
  L1 (SGN) w0.2: U2.3 4.5,7.9 5.4,8.8 L1.1
NetL2_1: L2.1 L3.2 | length 1.4
  L1 (SGN) w0.1: L3.2 8.2,21.61 L2.1
NetL2_2: L2.2 U1.B3 | length 5.5
  L1 (SGN) w0.1: L2.2 7.21,19.99 8.453,18.747 9.052,18.747 9.342,18.747 11.071,18.747 U1.B3
NetLED1_1: LED1.1 R9.2 | length 2.1
  L1 (SGN) w0.1: LED1.1 16.8,30.71 R9.2@17,30.51
NetLED2_1: LED2.1 R7.2 | length 2.1
  L1 (SGN) w0.1: R7.2 LED2.1
NetLED3_1: LED3.1 R3.2 | length 2.1
  L1 (SGN) w0.1: R3.2 LED3.1
NetR5_1: R5.1 U2.9 | length 0.9
  L1 (SGN) w0.2: R5.1 3.26,6.74 U2.9
NetR6_2: R6.2 U2.7 | length 1.1
  L1 (SGN) w0.2: U2.7@5.7,7.25 6.25,7.8 R6.2
NFC1: R1.1 U1.L24 | length 16.6
  L1 (SGN) w0.1: U1.L24 cw(c17.656,20.475) 17.278,20.853 18.131,21.706 cw(c18.841,20.996) 18.841,22 20.415,22 ccw(c20.415,24.59) 22.246,22.759 ccw(c14.106,31.533) 26.066,31.996 R1.1
NFC2: R2.1 U1.J24 | length 15.8
  L1 (SGN) w0.1: U1.J24 17.97,22.031 cw(c19.766,20.235) 19.766,22.775 20.023,22.775 ccw(c20.023,25.833) 22.185,23.671 ccw(c17.01,29.257) 24.625,29.257 R2.1 24.625,32.433
PER0_N: J3.27 U1.AD16 | length 21
  L1 (SGN) w0.1: J3.27 17.75,-1.939 17.75,0.378 18.18,0.808 18.18,1.02 v1(18.286,0.914) ; U1.AD16 17.79,16.193 17.828,16.154 17.828,15.672 19,14.5 19.051,14.449 v1(19.07,14.468)
  L6 (SGN) w0.1: v1(18.286,0.914) 18.194,1.006 18.378,1.191 18.562,1.191 18.572,1.2 19.265,1.893 19.265,14.257 19.265,14.344 19.105,14.504 v1(19.07,14.468)
PER0_P: J3.25 U1.AD18 | length 21.3
  L1 (SGN) w0.1: U1.AD18 18.182,16.558 18.308,16.431 18.308,16.232 18.308,15.927 18.308,15.87 18.988,15.191 19.279,14.9 v1(19.6,14.9) ; J3.25 18.25,-1.939 18.25,0.171 18.329,0.25 v1(18.639,0.561)
  L6 (SGN) w0.1: v1(18.639,0.561) 18.639,0.589 18.745,0.483 18.916,0.653 18.916,0.865 19.745,1.694 19.745,14.455 19.745,14.822 19.633,14.933 v1(19.6,14.9)
PER1_N: J3.61 U1.B11 | length 26.6
  L1 (SGN) w0.1: J3.61 9.27,-2.98 9.145,-2.98 9.145,-2.072 9.295,-1.922 9.295,3.523 9.856,4.084 9.856,4.243 10.225,4.612 10.747,4.612 10.979,4.379 v3(10.9,4.3)
  L3 (SGN) w0.1: v3(10.9,4.3) 10.852,4.348 10.931,4.427 10.747,4.612 10.376,4.612 10.275,4.713 10.275,16.567 12.478,18.77 12.69,18.77 13.06,19.139 13.06,19.661 12.923,19.798 v4(12.875,19.75)
  other v3: 12.875,19.75
  other v4: 10.9,4.3
PER1_P: J3.59 U1.B9 | length 24.4
  L1 (SGN) w0.1: J3.59@9.752,-3 9.855,-3 9.855,-2.072 9.775,-1.991 9.775,3.325 10.305,3.855 10.331,3.828 v4(10.486,3.982)
  L3 (SGN) w0.1: v4(10.486,3.982) 10.406,3.903 10.27,4.039 9.795,4.514 9.795,16.765 12.43,19.4 v3(12.43,19.411)
  other v3: 10.486,3.982
  other v4: 12.43,19.411
PERST0: J3.37 J3.52 U1.T2 | length 19.1
  L1 (SGN) w0.1: v1(13.55,8.225) 13.55,7.05 15.25,5.35 J3.37
  L3 (SGN) w0.1: v1(13.55,8.225) 13.55,15.125 v6(13.775,15.35)
  other v5: 13.775,15.35
PERST1: J3.66 U1.A12 | length 26.8
  L1 (SGN) w0.1: v1(11.975,21.1) 12.702,20.373 U1.A12
  L6 (SGN) w0.1: J3.66 8,2.425 10.2,4.625 10.2,6.333 10.65,6.783 10.65,19.775 v1(11.975,21.1)
PET1_N: J3.67 U1.B15 | length 29.5
  L1 (SGN) w0.1: J3.67 7.757,-2.993 7.757,-2.98 7.748,-2.98 7.75,-2.978 7.75,-1.939 7.75,0.925 7.669,1.006 7.669,1.544 8.05,1.925 8.588,1.925 8.757,1.757 v4(8.675,1.675)
  L3 (SGN) w0.1: v4(8.675,1.675) 8.742,1.742 9.721,1.742 10.592,2.613 12.517,2.613 14.473,4.569 14.473,14.143 14.473,14.433 14.58,14.539 14.58,19.643 13.674,20.549 v4(13.596,20.471)
  other v3: 8.675,1.675 13.596,20.471
PET1_P: J3.65 U1.B13 | length 28.3
  L1 (SGN) w0.1: J3.65 8.237,-2.987 8.237,1.193 v3(8.319,1.275)
  L3 (SGN) w0.1: v3(8.319,1.275) 8.251,1.208 8.045,1.414 8.045,1.936 8.414,2.305 8.936,2.305 9.605,2.305 10.393,3.093 12.318,3.093 14.273,5.048 14.273,13.664 14.273,18.904 13.151,20.026 v4(13.229,20.104)
  other v3: 13.229,20.104
  other v4: 8.319,1.275
PEWAKE: J3.70 U1.A16 | length 29.8
  L1 (SGN) w0.1: v1(12.689,21.725) U1.A16
  L6 (SGN) w0.1: J3.70 7,2.183 8.2,3.383 8.2,19.625 10.625,22.05 12.364,22.05 v1(12.689,21.725)
PEWAKEO: J3.55 U1.A10 | length 25.4
  L1 (SGN) w0.1: J3.55 10.75,-0.7 10.75,0.136 11.025,0.411 v1(11.025,0.425) ; v1(11.918,20.375) U1.A10
  L6 (SGN) w0.1: v1(11.025,0.425) 12.175,1.575 12.175,5.775 11.2,6.75 11.2,15.5 12.025,16.325 12.025,20.268 v1(11.918,20.375)
QSPI_CLK: U1.AC11 U3.H2 | length 7.3
  L3 (SGN) w0.1: v5(16.591,15.702) 19.193,13.1 v5(22.8,13.1)
  other v6: 22.8,13.1 16.591,15.702
QSPI_CSN: U1.AC19 U3.D4 | length 7.1
  L3 (SGN) w0.1: v5(18.005,17.116) 19.284,17.116 21.9,14.5 23.3,14.5 23.5,14.3 v5(23.5,13.9)
  other v6: 23.5,13.9 18.005,17.116
QSPI_SIO0: U1.AC15 U3.G3 | length 7.3
  L3 (SGN) w0.1: v5(17.298,16.409) 18.891,16.409 21.4,13.9 22.9,13.9 23.15,13.65 v5(23.15,13.3)
  other v6: 23.15,13.3 17.298,16.409
QSPI_SIO1: U1.AC21 U3.F4 | length 7.8
  L3 (SGN) w0.1: v5(18.359,17.47) 19.33,17.47 22.1,14.7 23.4,14.7 23.9,14.2 23.9,13.9 v5(23.5,13.5)
  other v6: 23.5,13.5 18.359,17.47
QSPI_SIO2: U1.AC17 U3.H4 | length 10.8
  L3 (SGN) w0.1: v5(17.652,16.763) 17.163,16.763 16.2,15.8 16.2,15.5 19,12.7 23.1,12.7 v5(23.5,13.1)
  other v6: 23.5,13.1 17.652,16.763
QSPI_SIO3: U1.AC13 U3.F2 | length 6.9
  L3 (SGN) w0.1: v5(16.945,16.055) 19.5,13.5 v5(22.8,13.5)
  other v6: 22.8,13.5 16.945,16.055
REFCLK0_N: J3.49 U1.G1 | length 20.9
  L1 (SGN) w0.1: U1.G1 11.818,16.558 11.692,16.431 11.692,16.295 10.445,15.049 10.445,11.826 12.25,10.021 J3.49
REFCLK0_P: J3.47 U1.J1 | length 20.5
  L1 (SGN) w0.1: U1.J1 12.172,16.097 10.925,14.85 10.925,12.025 12.75,10.2 J3.47
REFCLK1_N: J3.73 U1.B19 | length 31.6
  L1 (SGN) w0.1: J3.73 6.25,0.105 v3(6.513,0.368)
  L3 (SGN) w0.1: v3@6.525,0.41 10.06,0.41 11.583,1.933 12.798,1.933 15.98,5.115 15.98,6.33 15.98,13.21 15.98,14.305 15.98,19.205 14.426,20.758 14.426,20.815 14.419,20.822 14.419,21.027 14.293,21.154 v3(14.293,21.182)
  other v4: 6.513,0.368 14.293,21.182
REFCLK1_P: J3.71 U1.B17 | length 31.1
  L1 (SGN) w0.1: v3(6.496,0.885) 6.534,0.848 6.712,0.848 6.993,0.566 6.993,0.169 6.75,-0.074 J3.71
  L3 (SGN) w0.1: v3@6.525,0.89 9.861,0.89 11.384,2.413 12.6,2.413 15.354,5.167 15.354,19.152 13.946,20.559 13.946,20.616 13.939,20.624 v3(13.939,20.828)
  other v4: 6.496,0.885 13.939,20.828
SUSCLK: J3.50 U1.A20 | length 27.5
  L1 (SGN) w0.1: v1(13.725,22.175) 14.116,21.784 U1.A20
  L6 (SGN) w0.1: J3.50 12,0.075 12.7,0.775 12.7,13.225 11.525,14.4 11.525,15.425 13.229,17.129 13.229,21.679 v1(13.725,22.175)
USB_D_N: J3.5 U1.AD4 | length 20.2
  L1 (SGN) w0.1: U1.AD4 23.25,6.568 J3.5
USB_D_P: J3.3 U1.AD6 | length 20.6
  L1 (SGN) w0.1: U1.AD6 23.75,6.775 J3.3
VDD: C1.2 C5.2 C7.2 C9.2 C10.2 C11.2 C27.2 C28.2 L1.2 LED1.2 LED2.2 LED3.2 R5.2 R8.2 TP1.1 TP2.1 U1.A22 U1.AB2 U1.AD23 U1.B1 U1.W1 U1.Y2 U3.D2 | length 28.6
  L1 (SGN) w0.1: v1(1.8,7.2) R5.2 ; R8.2 v1(7.6,5.4) ; C28.2@7,6.1 C28.2 v1(7.6,6.2) ; v1(21.6,14.3) 22.055,13.845 22.745,13.845 U3.D2
  L1 (SGN) w0.2: L1.2 v1(5.4,13.8) ; C27.2 v1(7.6,12) ; v1(8.947,19.322) 9.347,19.322 C11.2 ; v1(9.6,17.9) 10.504,17.9 U1.B1 ; v1(11.7,13.68) 11.69,13.69 11.69,13.7 11.6,13.7 11.6,13.4 C9.2 12.715,13.909 C7.2 13.446,14.464 U1.W1 14.116,14.641 U1.Y2 14.47,14.63 14.73,14.37 14.74,14.37 v1(14.823,14.288) ; v1@12.125,33.625 12.15,33.6 LED2.2 LED3.2 LED1.2 v1(18.1,33.6) ; C5.2@13.774,23.401 v1(14.325,22.85) 14.47,22.705 U1.A22 ; U1.AD23 19.96,17.646 C10.2 20.203,17.397 v1(20.7,16.9) ; C1.2 v1(24.8,15.6)
  L6 (SGN) w0.1: TP2.1@1.8,5.2 TP2.1
  L6 (SGN) w0.2: TP2.1@1.8,5.2 v1(1.8,7.2) ; v1(5.4,13.8) 5.8,13.8 TP1.1 ; v1@8.947,19.37 8.947,18.753 9.6,18.1 v1(9.6,17.9)
  other v1: 12.1,33.6
VIN: C8.2 C24.2 J3.2 J3.4 J3.72 J3.74 TP5.1 TP6.1 U1.AD2 U2.1 U2.2 U2.8 | length 30.3
  L1 (SGN) w0.2: v1(3.35,9.15) 3.5,9 v1(3.5,7.41) ; v1(3.5,4.9) U2.1@3.5,5.99 ; C8.2 14.891,10.584 v1(14.9,10.575) ; U1.AD2 15.543,13.757 v1(15.675,13.625)
  L6 (SGN) w0.2: TP6.1 2,10.3 v1(2.8,9.5) ; TP5.1 3.5,3.6 v1(3.5,4.9) ; v1(5.2,1.2) 5.2,0.534 6,-0.266 J3.74 ; J3.72 v1(6.5,1.6) ; v1(22.8,1) 23.5,0.3 J3.4 ; J3.2 24,0.6 v1(24.4,1)
  other v1: 4,6 3.3,6.15 4,6.7 4,7.4
VIO_CFG: J3.18 U1.Y23 | length 22.6
  L1 (SGN) w0.1: U1.Y23 v1(18.75,18.139) ; v1(18.475,2.025) 18.475,1.625 19.45,0.65 v1(19.7,0.65)
  L6 (SGN) w0.1: v1(18.475,2.025) 18.475,16.225 18.75,16.5 v1(18.75,18.139) ; v1(19.7,0.65) 20,0.35 20,-1.35 J3.18
W_DISABLE1: J3.26 U1.L1 | length 22.9
  L1 (SGN) w0.1: v1(12.1,15.45) 12.525,15.875 U1.L1
  L6 (SGN) w0.1: v1(12.1,15.45) 14.508,15.45 15.877,14.081 17.7,12.258 17.7,11.108 17.7,1.005 18,0.705 J3.26
W_DISABLE2: J3.43 U1.M2 | length 19.9
  L1 (SGN) w0.1: v1(13.325,5.2) 13.75,4.775 J3.43
  L3 (SGN) w0.1: v6(13.05,16.05) 13.05,15.65 12.35,14.95 12.35,13.05 12.517,12.883 12.517,5.983 v1@13.325,5.175
  other v5: 13.05,16.05
pads on no net: J3.17 J3.19 J3.20 J3.21 J3.22 J3.35 J3.38 J3.40 J3.42 J3.44 J3.46 J3.48 J3.54 J3.56 J3.64 U1.AA24 U1.AC9 U1.AC24 U1.AD8 U1.AD10 U1.AD14 U1.P23 U1.T23 U1.TPAD*10@12.879,18 U1.TPAD*10@13.939,16.939 U1.TPAD*10@13.939,19.061 U1.TPAD*10@15,15.879 U1.TPAD*10@15,18 U1.TPAD*10@15,20.121 U1.TPAD*10@16.061,16.939 U1.TPAD*10@16.061,19.061 U1.TPAD*10@17.121,18 U1.U1 U1.V23 U3.A2 U3.A4 U3.B1 U3.B3 U3.B5 U3.C1 U3.C5 U3.J1 U3.J5 U3.K1 U3.K3 U3.K5 U3.L2 U3.L4
copper on no net:
  other v2: 16.718,20.24

## Polygon pours and split planes (outlines as drawn)
GND on L3 (SGN) "GND_L03_P005" (solid, remove dead copper, pour order 5): 5,-4 5,-0.2 ccw(c4.825,-0.2) 4.825,-0.025 -0.05,-0.025 cw(c-0.05,0) -0.075,0 -0.075,38 13.125,38 ccw(c14.925,38) 16.725,38 29.925,38 29.925,0 25.05,0 ccw(c25.05,-0.2) 24.85,-0.2 24.85,-3.975 22.15,-3.975 22.15,-1.1 ccw(c21.55,-1.1) 21.55,-0.5 ccw(c21.55,-1.1) 20.95,-1.1 20.95,-4
GND on L3 (SGN) "GND_L03_P002" (solid, remove dead copper, pour order 2): 17.7,22.4 6.5,33.6 6.3,33.6 5.7,33 16.8,21.9 16.8,21.4 17.7,22.3
GND on L3 (SGN) "GND_L03_P001" (solid, remove dead copper, pour order 1): 16.3,20.9 17.2,20 18,20 19.3,21.3 19.4,21.2 22.4,21.2 27.1,25.9 27.1,32.7 26.5,32.7 23.9,32.7 23.9,28.21 23,26.5 22.1,24.6 20.7,23.2 18.6,23.2
GND on L6 (SGN) "GND_L06_P006" (solid, remove dead copper, pour order 6): 5,-4 5,-0.2 ccw(c4.825,-0.2) 4.825,-0.025 -0.05,-0.025 cw(c-0.05,0) -0.075,0 -0.075,38 13.125,38 ccw(c14.925,38) 16.725,38 29.925,38 29.925,0 25.05,0 ccw(c25.05,-0.2) 24.85,-0.2 24.85,-3.975 22.15,-3.975 22.15,-1.1 ccw(c21.55,-1.1) 21.55,-0.5 ccw(c21.55,-1.1) 20.95,-1.1 20.95,-4
GND on L1 (SGN) "GND_L01_P004" (solid, remove dead copper, pour order 4): 5,-4 5,-0.2 ccw(c4.825,-0.2) 4.825,-0.025 -0.05,-0.025 cw(c-0.05,0) -0.075,0 -0.075,38 13.125,38 ccw(c14.925,38) 16.725,38 29.925,38 29.925,0 25.05,0 ccw(c25.05,-0.2) 24.85,-0.2 24.85,-3.975 22.15,-3.975 22.15,-1.1 ccw(c21.55,-1.1) 21.55,-0.5 ccw(c21.55,-1.1) 20.95,-1.1 20.95,-4
VDD on L4 (GND/PWR) (split plane): 29.465,14.029 14.6,14.029 14.55,14.02 14.508,13.992 13.808,13.292 13.78,13.25 13.771,13.2 13.771,5.954 12.946,5.129 6.654,5.129 5.192,6.592 5.15,6.62 5.1,6.629 0.485,6.629 0.485,37.515 12.724,37.515 12.744,37.427 12.804,37.235 12.881,37.049 12.974,36.87 13.083,36.7 13.205,36.54 13.341,36.391 13.49,36.255 13.65,36.133 13.82,36.024 13.999,35.931 14.185,35.854 14.377,35.794 14.574,35.75 14.774,35.724 14.975,35.715 15.176,35.724 15.376,35.75 15.573,35.794 15.765,35.854 15.951,35.931 16.13,36.024 16.3,36.133 16.46,36.255 16.609,36.391 16.745,36.54 16.867,36.7 16.976,36.87 17.069,37.049 17.146,37.235 17.206,37.427 17.226,37.515 29.465,37.515
VIN on L4 (GND/PWR) (split plane): 29.465,0.535 25.1,0.535 25.086,0.534 24.989,0.526 24.881,0.5 24.778,0.458 24.683,0.4 24.598,0.327 24.525,0.242 24.467,0.147 24.425,0.044 24.399,-0.064 24.391,-0.161 24.39,-0.175 24.39,-3.44 22.71,-3.44 22.71,-1.075 22.71,-1.073 22.701,-0.93 22.673,-0.788 22.626,-0.65 22.562,-0.52 22.481,-0.399 22.385,-0.29 22.276,-0.194 22.155,-0.113 22.025,-0.049 21.887,-0.002 21.745,0.026 21.602,0.035 21.6,0.035 21.598,0.035 21.455,0.026 21.313,-0.002 21.175,-0.049 21.045,-0.113 20.924,-0.194 20.815,-0.29 20.719,-0.399 20.638,-0.52 20.574,-0.65 20.527,-0.788 20.499,-0.93 20.49,-1.073 20.49,-1.075 20.49,-3.465 5.56,-3.465 5.56,-0.175 5.559,-0.157 5.552,-0.068 5.527,0.037 5.485,0.136 5.429,0.228 5.359,0.309 5.278,0.379 5.186,0.435 5.087,0.477 4.982,0.502 4.893,0.509 4.875,0.51 0.485,0.51 0.485,6.371 5.046,6.371 6.508,4.908 6.55,4.88 6.6,4.871 13,4.871 13.05,4.88 13.092,4.908 13.992,5.808 14.02,5.85 14.029,5.9 14.029,13.146 14.654,13.771 29.465,13.771
GND on L5 (PWR/GND) (split plane): 29.465,0.535 25.1,0.535 25.086,0.534 24.989,0.526 24.881,0.5 24.778,0.458 24.683,0.4 24.598,0.327 24.525,0.242 24.467,0.147 24.425,0.044 24.399,-0.064 24.391,-0.161 24.39,-0.175 24.39,-3.44 22.71,-3.44 22.71,-1.075 22.71,-1.073 22.701,-0.93 22.673,-0.788 22.626,-0.65 22.562,-0.52 22.481,-0.399 22.385,-0.29 22.276,-0.194 22.155,-0.113 22.025,-0.049 21.887,-0.002 21.745,0.026 21.602,0.035 21.6,0.035 21.598,0.035 21.455,0.026 21.313,-0.002 21.175,-0.049 21.045,-0.113 20.924,-0.194 20.815,-0.29 20.719,-0.399 20.638,-0.52 20.574,-0.65 20.527,-0.788 20.499,-0.93 20.49,-1.073 20.49,-1.075 20.49,-3.465 5.56,-3.465 5.56,-0.175 5.559,-0.157 5.552,-0.068 5.527,0.037 5.485,0.136 5.429,0.228 5.359,0.309 5.278,0.379 5.186,0.435 5.087,0.477 4.982,0.502 4.893,0.509 4.875,0.51 0.485,0.51 0.485,37.515 12.724,37.515 12.744,37.427 12.804,37.235 12.881,37.049 12.974,36.87 13.083,36.7 13.205,36.54 13.341,36.391 13.49,36.255 13.65,36.133 13.82,36.024 13.999,35.931 14.185,35.854 14.377,35.794 14.574,35.75 14.774,35.724 14.975,35.715 15.176,35.724 15.376,35.75 15.573,35.794 15.765,35.854 15.951,35.931 16.13,36.024 16.3,36.133 16.46,36.255 16.609,36.391 16.745,36.54 16.867,36.7 16.976,36.87 17.069,37.049 17.146,37.235 17.206,37.427 17.226,37.515 29.465,37.515
GND on L2 (GND) (split plane): 29.465,0.535 25.1,0.535 25.086,0.534 24.989,0.526 24.881,0.5 24.778,0.458 24.683,0.4 24.598,0.327 24.525,0.242 24.467,0.147 24.425,0.044 24.399,-0.064 24.391,-0.161 24.39,-0.175 24.39,-3.44 22.71,-3.44 22.71,-1.075 22.71,-1.073 22.701,-0.93 22.673,-0.788 22.626,-0.65 22.562,-0.52 22.481,-0.399 22.385,-0.29 22.276,-0.194 22.155,-0.113 22.025,-0.049 21.887,-0.002 21.745,0.026 21.602,0.035 21.6,0.035 21.598,0.035 21.455,0.026 21.313,-0.002 21.175,-0.049 21.045,-0.113 20.924,-0.194 20.815,-0.29 20.719,-0.399 20.638,-0.52 20.574,-0.65 20.527,-0.788 20.499,-0.93 20.49,-1.073 20.49,-1.075 20.49,-3.465 5.56,-3.465 5.56,-0.175 5.559,-0.157 5.552,-0.068 5.527,0.037 5.485,0.136 5.429,0.228 5.359,0.309 5.278,0.379 5.186,0.435 5.087,0.477 4.982,0.502 4.893,0.509 4.875,0.51 0.485,0.51 0.485,37.515 12.724,37.515 12.744,37.427 12.804,37.235 12.881,37.049 12.974,36.87 13.083,36.7 13.205,36.54 13.341,36.391 13.49,36.255 13.65,36.133 13.82,36.024 13.999,35.931 14.185,35.854 14.377,35.794 14.574,35.75 14.774,35.724 14.975,35.715 15.176,35.724 15.376,35.75 15.573,35.794 15.765,35.854 15.951,35.931 16.13,36.024 16.3,36.133 16.46,36.255 16.609,36.391 16.745,36.54 16.867,36.7 16.976,36.87 17.069,37.049 17.146,37.235 17.206,37.427 17.226,37.515 29.465,37.515

## Other copper
L1 (SGN):
  pour cut-out: 17.225,22.253 17.25,22.253 17.328,22.237 17.419,22.199 17.485,22.155 17.555,22.085 17.599,22.019 17.637,21.928 17.653,21.85 17.653,21.75 17.637,21.672 17.599,21.581 17.555,21.515 17.485,21.445 17.419,21.401 17.328,21.363 17.25,21.347 17.183,21.347 16.608,20.772 16.601,20.763 16.607,20.749 16.627,20.652 16.607,20.555 16.568,20.459 16.546,20.426 16.513,20.377 16.485,20.358 16.43,20.322 16.335,20.282 16.237,20.263 16.14,20.282 16.045,20.322 15.962,20.377 15.944,20.404 15.907,20.459 15.868,20.555 15.848,20.652 15.868,20.749 15.907,20.844 15.929,20.877 15.962,20.927 15.987,20.943 16.005,20.987 16.116,21.152 16.133,21.17 16.147,21.191 16.168,21.204 16.186,21.222 16.187,21.223 16.747,21.783 16.747,21.85 16.763,21.928 16.801,22.019 16.845,22.085 16.915,22.155 16.981,22.199 17.072,22.237 17.15,22.253 17.175,22.253 17.2,22.258
L3 (SGN):
  region net GND: 16.2,25.6 21.7,25.6 21.7,23.5 21.6,23.4 16.4,23.4 15.6,22.6 15.6,22 14.7,22 14.6,22.1 14.6,24
L2 (GND) (plane layer: these items are gaps in the copper):
  pour cut-out: 16.2,25.6 21.7,25.6 21.7,23.5 21.6,23.4 16.4,23.4 15.6,22.6 15.6,22 14.7,22 14.6,22.1 14.6,24
  pour cut-out: 186 vertices and 0 holes, not listed, extent 16.379,20.439 25.149,32.741
  pour cut-out: 167 vertices and 0 holes, not listed, extent 16.732,20.086 26.499,32.724
L4 (GND/PWR) (plane layer: these items are gaps in the copper):
  pour cut-out: 6.625,33.253 6.65,33.253 6.728,33.237 6.819,33.199 6.885,33.155 6.955,33.085 6.999,33.019 7.037,32.928 7.053,32.85 7.053,32.783 16.348,23.487 16.361,23.48 16.366,23.473 16.374,23.468 16.381,23.457 16.391,23.45 16.613,23.178 16.625,23.156 16.641,23.137 16.806,22.828 16.813,22.804 16.825,22.782 16.927,22.446 16.929,22.422 16.936,22.398 16.952,22.236 17.011,22.212 17.072,22.237 17.15,22.253 17.175,22.253 17.2,22.258 17.225,22.253 17.25,22.253 17.328,22.237 17.419,22.199 17.485,22.155 17.555,22.085 17.599,22.019 17.637,21.928 17.653,21.85 17.653,21.75 17.637,21.672 17.599,21.581 17.555,21.515 17.485,21.445 17.419,21.401 17.328,21.363 17.25,21.347 17.15,21.347 17.072,21.363 16.981,21.401 16.915,21.445 16.845,21.515 16.801,21.581 16.775,21.643 16.542,21.739 16.524,21.751 16.483,21.779 16.442,21.806 16.422,21.836 16.387,21.888 16.375,21.906 16.371,21.926 16.371,21.927 16.363,21.963 16.352,21.999 16.323,22.301 16.242,22.567 16.111,22.813 15.923,23.042 6.617,32.347 6.55,32.347 6.472,32.363 6.381,32.401 6.315,32.445 6.245,32.515 6.201,32.581 6.163,32.672 6.147,32.75 6.147,32.85 6.163,32.928 6.201,33.019 6.245,33.085 6.315,33.155 6.381,33.199 6.472,33.237 6.55,33.253 6.575,33.253 6.6,33.258
  lines w0.254: 0,6.5 5.1,6.5 6.6,5 13,5 13.9,5.9 13.9,13.2 14.6,13.9 15.7,13.9 30,13.9
L5 (PWR/GND) (plane layer: these items are gaps in the copper):
  pour cut-out: 6.625,33.253 6.65,33.253 6.728,33.237 6.819,33.199 6.885,33.155 6.955,33.085 6.999,33.019 7.037,32.928 7.053,32.85 7.053,32.783 16.348,23.487 16.361,23.48 16.366,23.473 16.374,23.468 16.381,23.457 16.391,23.45 16.613,23.178 16.625,23.156 16.641,23.137 16.806,22.828 16.813,22.804 16.825,22.782 16.927,22.446 16.929,22.422 16.936,22.398 16.952,22.236 17.011,22.212 17.072,22.237 17.15,22.253 17.175,22.253 17.2,22.258 17.225,22.253 17.25,22.253 17.328,22.237 17.419,22.199 17.485,22.155 17.555,22.085 17.599,22.019 17.637,21.928 17.653,21.85 17.653,21.75 17.637,21.672 17.599,21.581 17.555,21.515 17.485,21.445 17.419,21.401 17.328,21.363 17.25,21.347 17.15,21.347 17.072,21.363 16.981,21.401 16.915,21.445 16.845,21.515 16.801,21.581 16.775,21.643 16.542,21.739 16.524,21.751 16.483,21.779 16.442,21.806 16.422,21.836 16.387,21.888 16.375,21.906 16.371,21.926 16.371,21.927 16.363,21.963 16.352,21.999 16.323,22.301 16.242,22.567 16.111,22.813 15.923,23.042 6.617,32.347 6.55,32.347 6.472,32.363 6.381,32.401 6.315,32.445 6.245,32.515 6.201,32.581 6.163,32.672 6.147,32.75 6.147,32.85 6.163,32.928 6.201,33.019 6.245,33.085 6.315,33.155 6.381,33.199 6.472,33.237 6.55,33.253 6.575,33.253 6.6,33.258

## Silkscreen, mask and mechanical layers (free items; w line width, h text height)
Top Overlay:
  text "Horgos Raul, TIE-2023 - Craiova" at 1.8,26.8 h0.5
Board Shape:
  the board outline again, w0.2

## Text inside footprints (layer, text, board x,y; h text height)
J3: Top Overlay "75" at 5.35,-1.9 h0.3; Top Overlay "1" at 24.275,-1.9 h0.3; Top Overlay "A" at 22.65,-1.05 h0.3; Bottom Overlay "74" at 6.55,-1.9 h0.3; Bottom Overlay "2" at 24.075,-1.9 h0.3